# Altium PCB NeoLink Basic Main Board.PcbDoc (part 1 of 5)
Units mm, origin at the board's own origin, x right, y up, seen from the top; angles counter-clockwise.
Board outline 70 x 115 mm, 6 copper layers (Top Layer, Layer 2, Layer 3, Layer 4, Layer 5, Bottom Layer), stack 1.148 mm thick; 467 components, 265 nets, 1397 pads, 1169 vias.
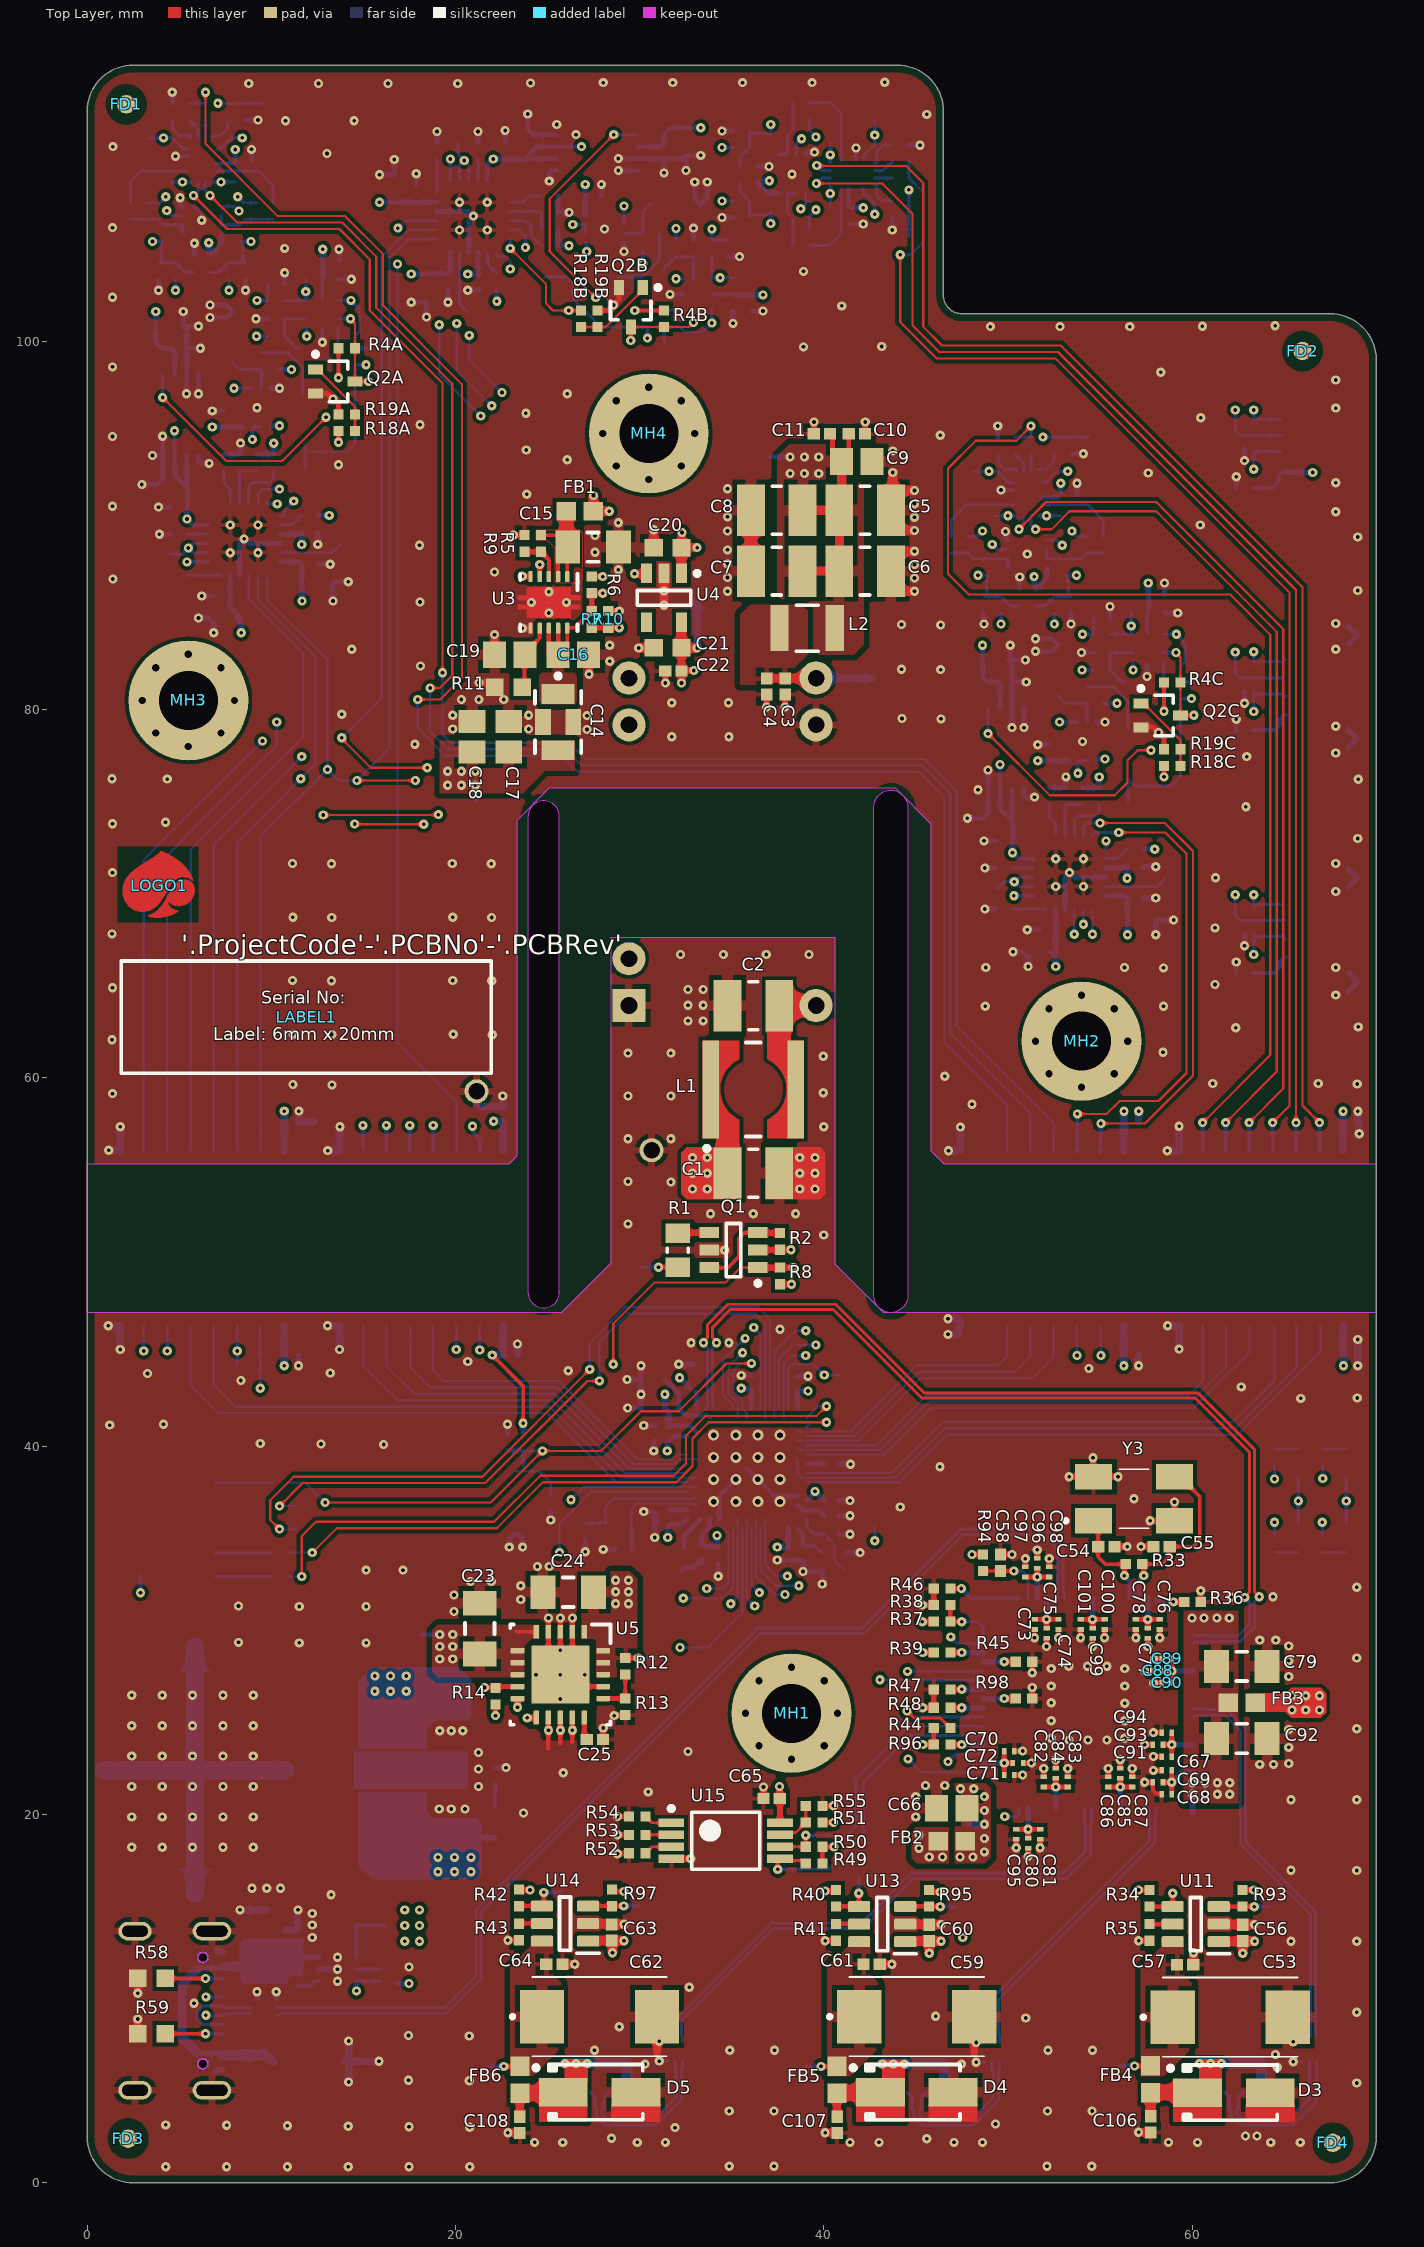
[diagram p0: Top Layer view]
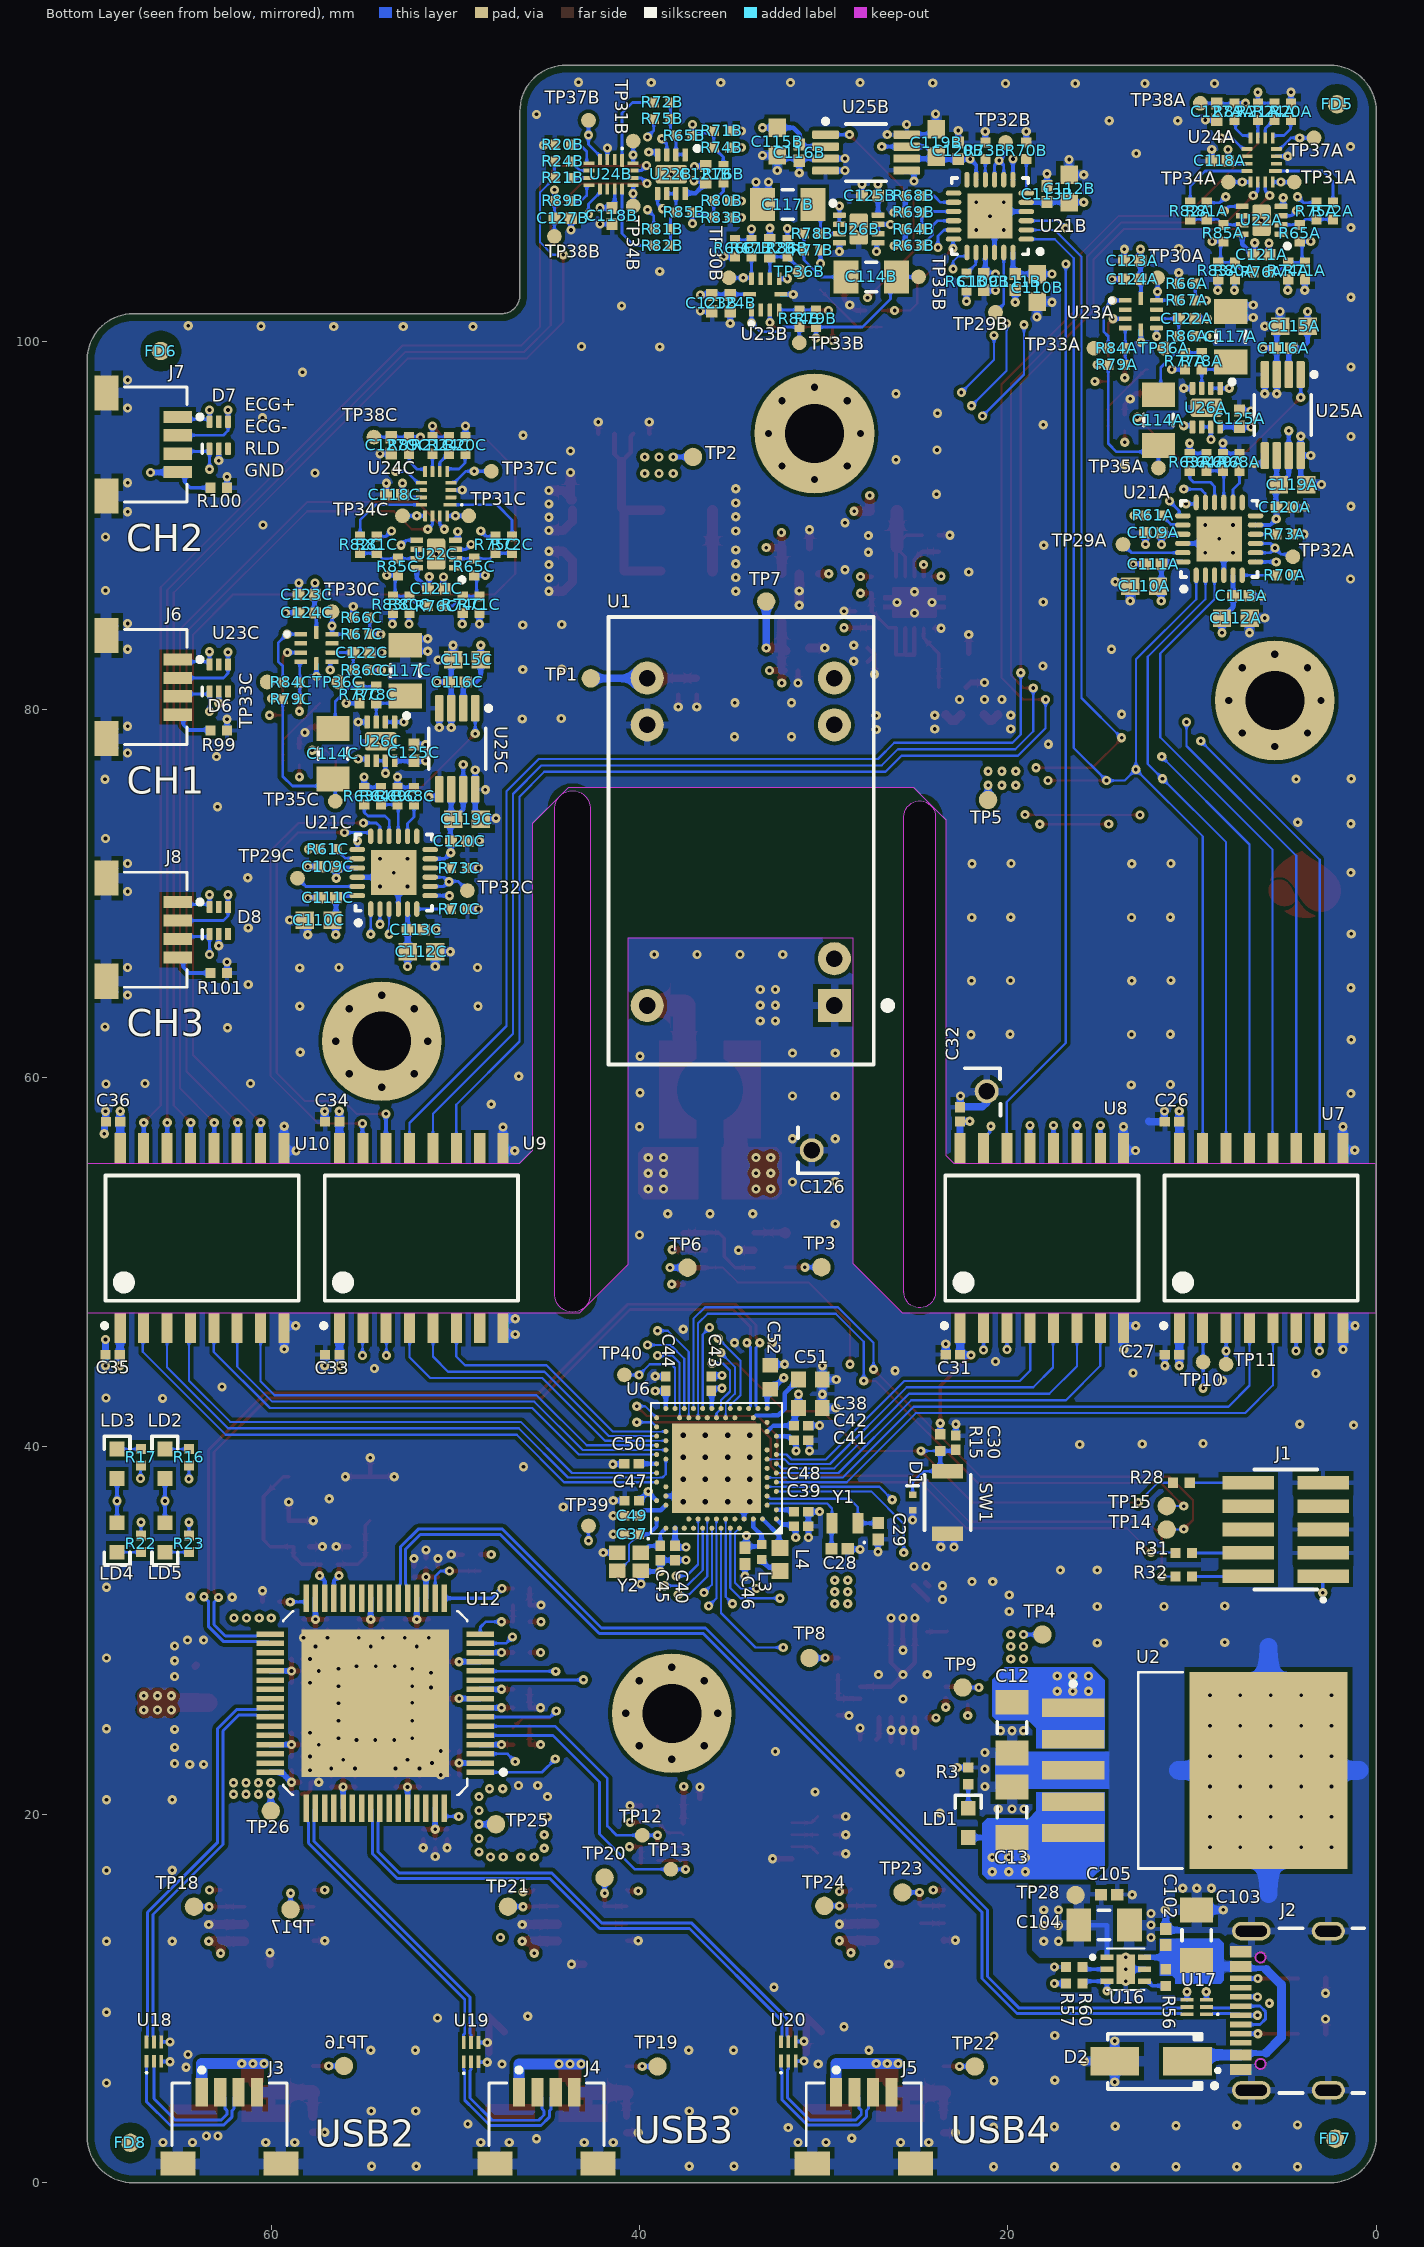
[diagram p1: Bottom Layer view, seen from below]
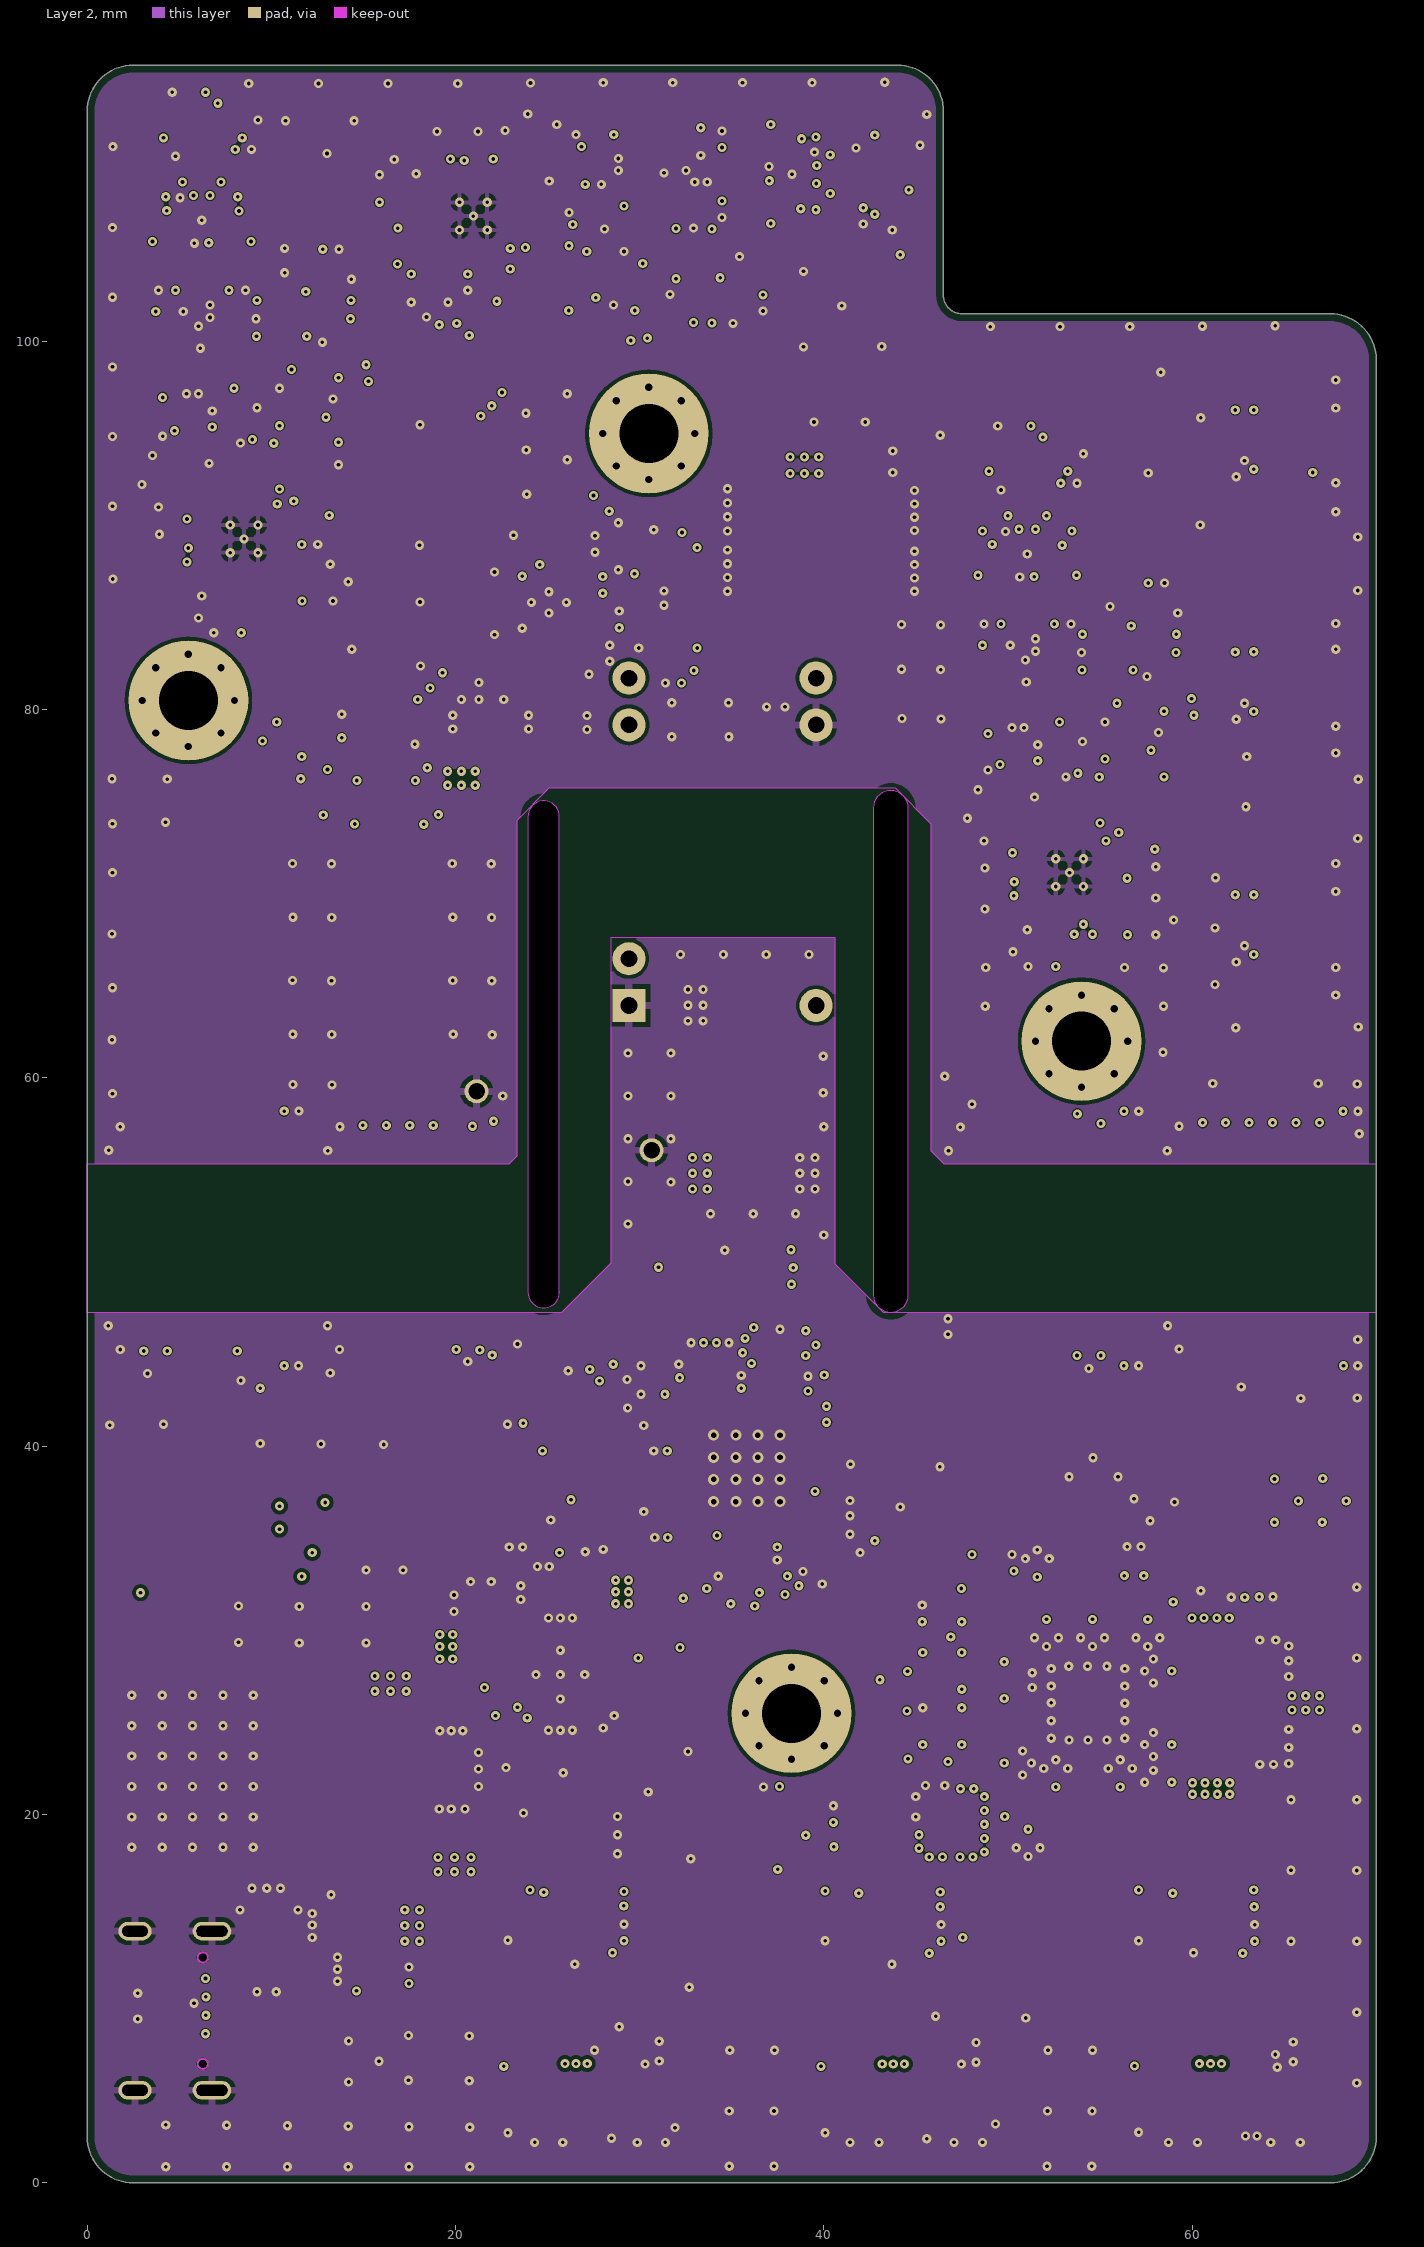
[diagram p2: Layer 2]
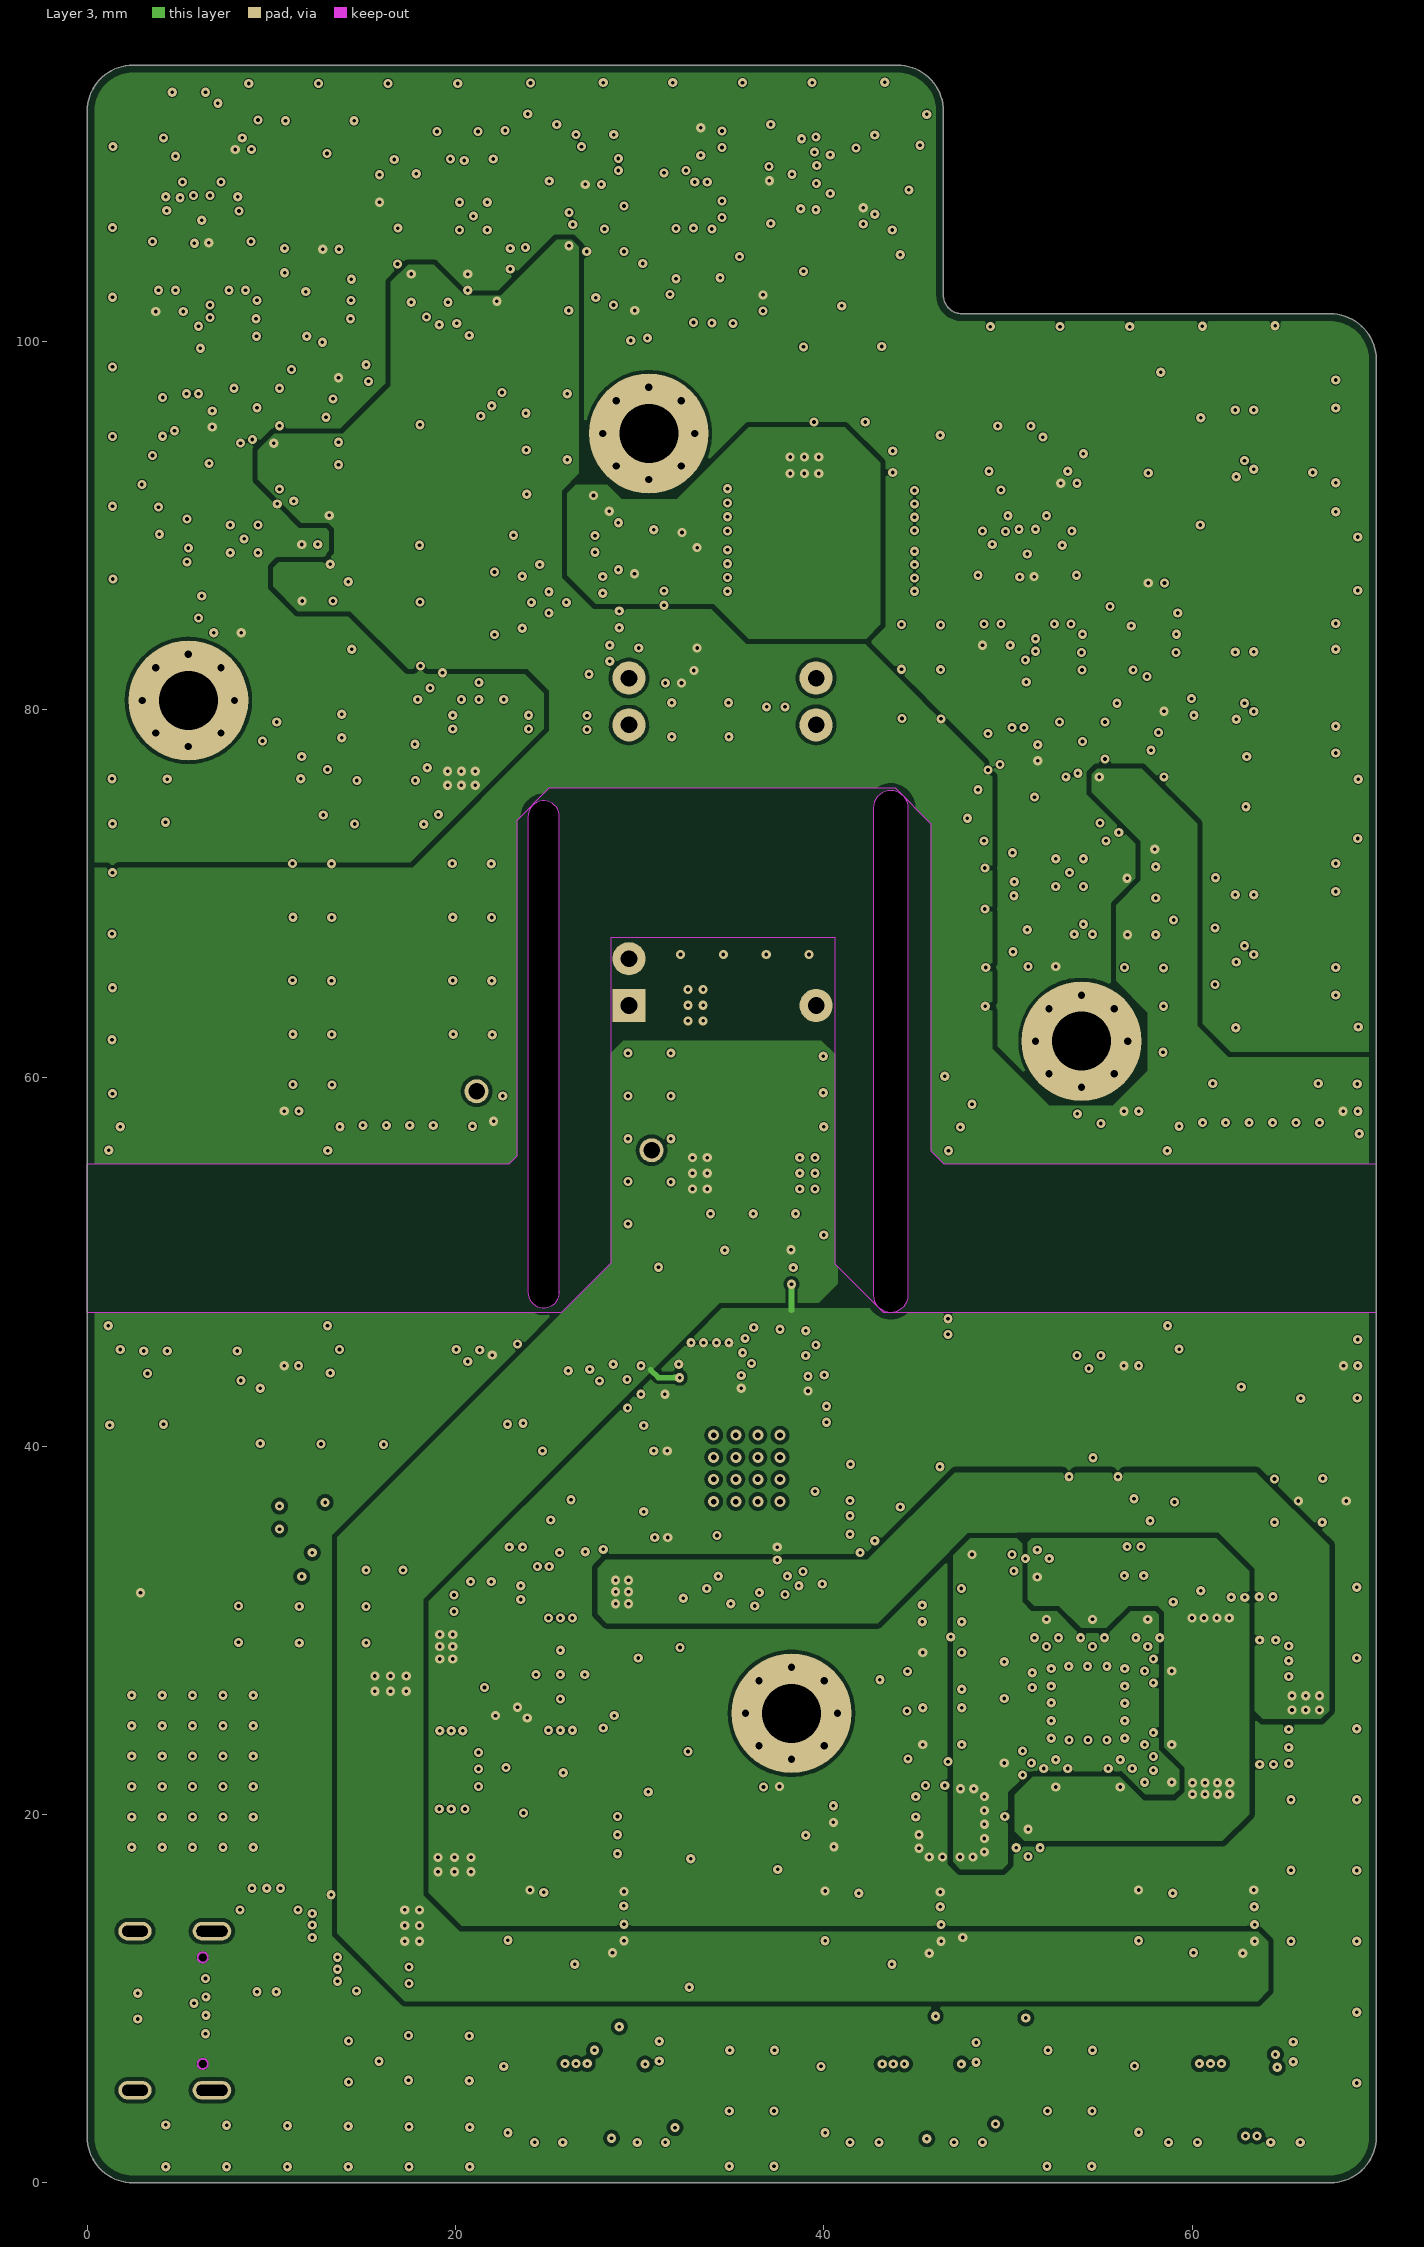
[diagram p3: Layer 3]
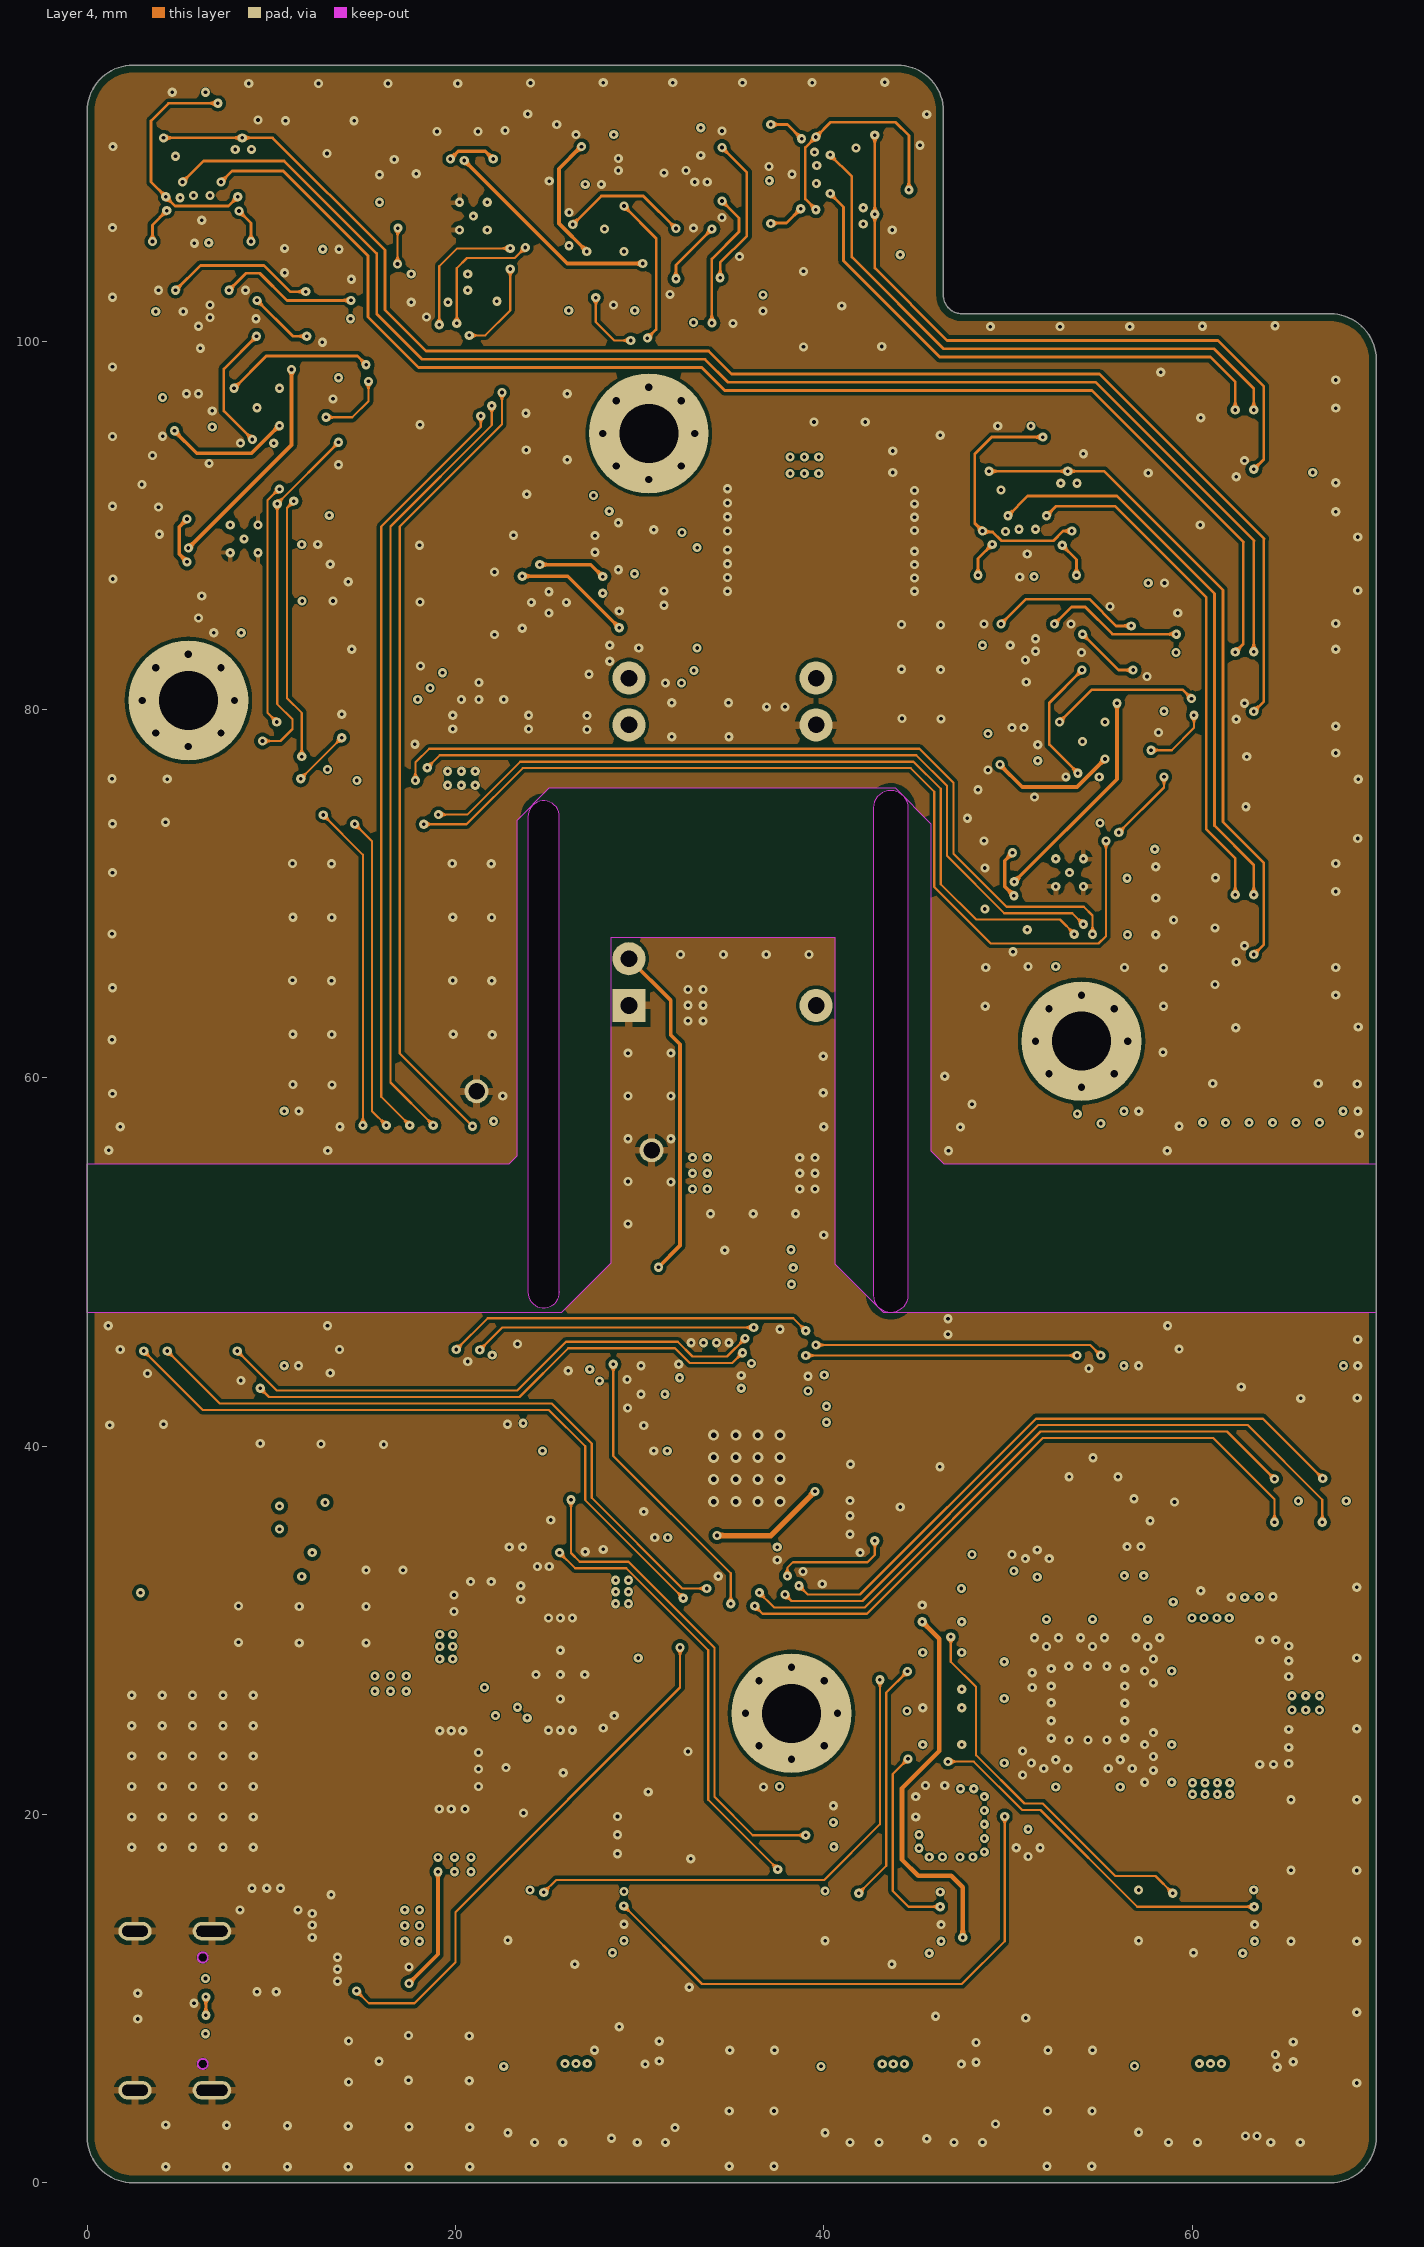
[diagram p4: Layer 4]
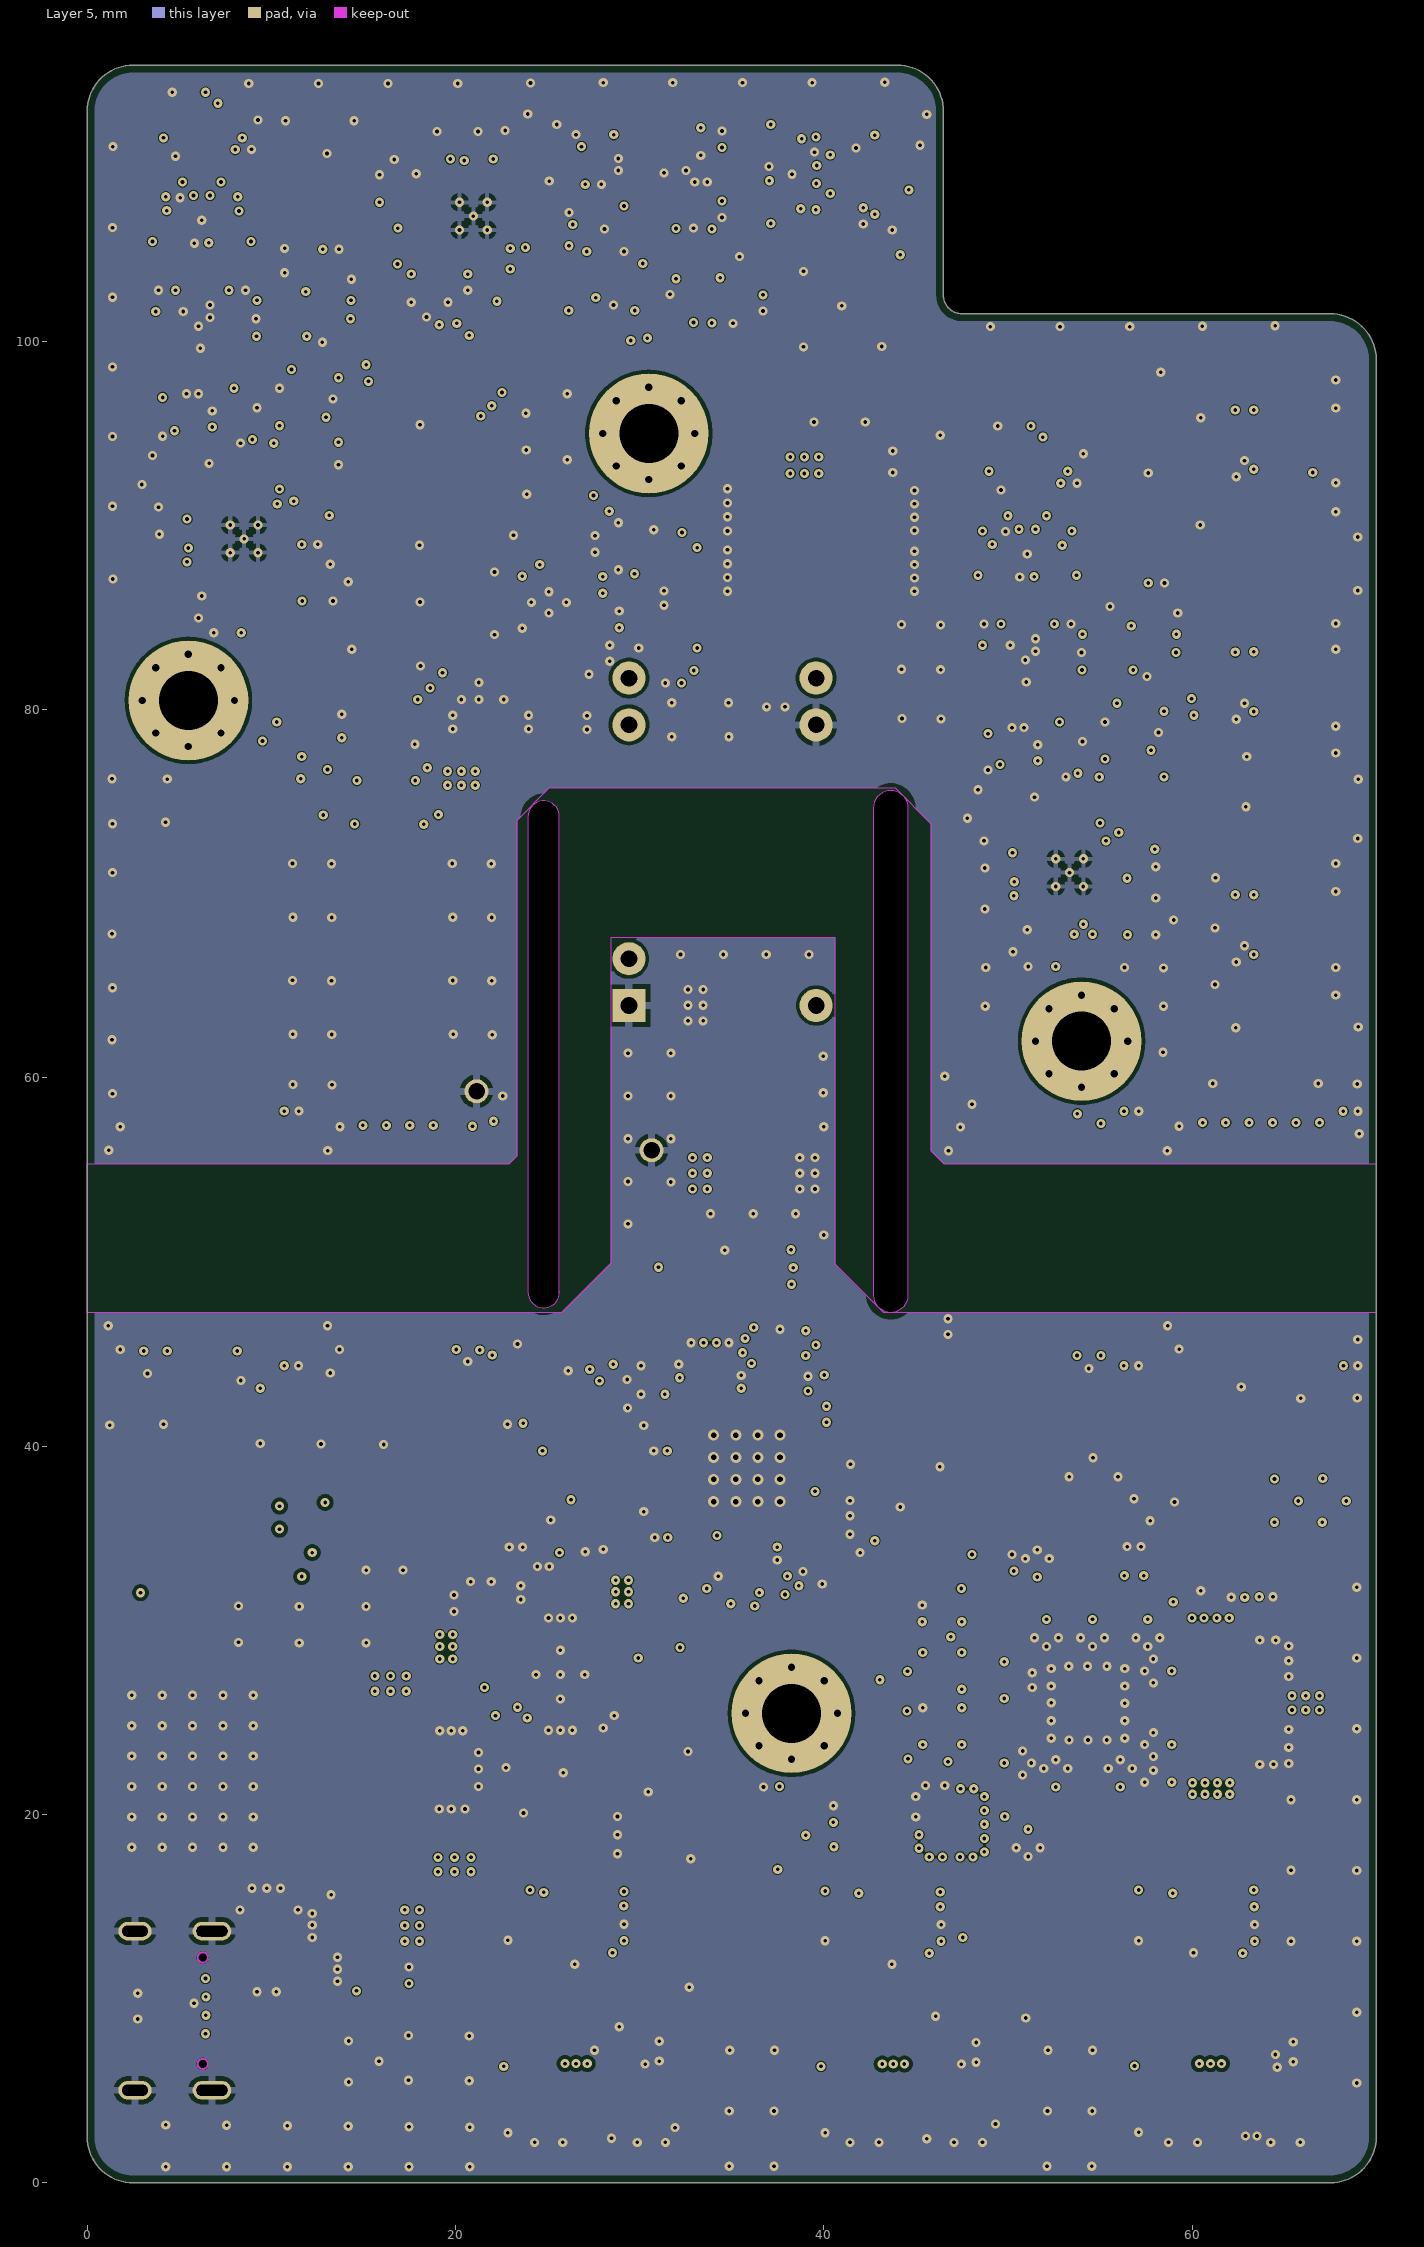
[diagram p5: Layer 5]

## Layer stack, top to bottom
Top Solder: solder mask 0.0102, Solder Resist, Dk 3.5
Top Layer: signal copper 0.035
Dielectric 2: prepreg 0.1195, 2116 RC58%, Dk 4.45
Layer 2: signal copper 0.035
Dielectric 4: core 0.23, 2116 RC58%, Dk 4.6
Layer 3: signal copper 0.035
Dielectric 1: prepreg 0.239, 2116 RC58% x 2, Dk 4.45
Layer 4: signal copper 0.035
Dielectric 5: core 0.23, 2116 RC58%, Dk 4.6
Layer 5: signal copper 0.035
Dielectric 3: prepreg 0.1195, 2116 RC58%, Dk 4.45
Bottom Layer: signal copper 0.035
Bottom Solder: solder mask 0.0102, Solder Resist, Dk 3.5

## Board outline
0,2.5 0,112.5 cw(c2.499,112.501) 2.5,115 44,115 cw(c44,112.5) 46.5,112.5 46.5,102.5 ccw(c47.5,102.5) 47.5,101.5 67.5,101.5 cw(c67.5,99) 70,99 70,2.5 cw(c67.501,2.499) 67.5,0 2.5,0 cw(c2.499,2.499)
cut-out: 23.935,48.372 ccw(c24.793,48.373) 25.65,48.386 25.65,48.375 25.65,74.189 ccw(c24.792,74.187) 23.935,74.175
cut-out: 42.684,48.204 ccw(c43.641,48.236) 44.599,48.208 44.6,48.225 44.6,74.679 ccw(c43.643,74.646) 42.685,74.675

## Design rules (kind name [scope] priority, off if disabled: settings)
BoardOutlineClearance [All] p1: gap=0.4 ignorepadtopadclearanceinfootprint=FALSE
Clearance Clearance_ISO [InNetClass('ISO_ECG_POWER') Or InNetClass('ISO_ECG_SIGNAL') Or InNetClass('A_Nets') Or InNetClass('B_Nets') Or InNetClass('C_Nets') Or InNetClass('ECG AFE_Nets') vs InNetClass('USB Ports_Nets') Or InNetClass('USB 2.0 Hub_Nets') Or (InNetClass('MCU_Nets') And Not InNetClass('ISO_ECG_SIGNAL')) Or (InNetClass('Power Supply_Nets') And Not InNetClass('ISO_ECG_POWER'))] p1: gap=5 ignorepadtopadclearanceinfootprint=FALSE except(0: Arc-Text Arc-Hole Track-Text Track-Hole SMDPad-Text SMDPad-Hole THPad-Text THPad-Hole Via-Text Via-Hole Fill-Text Fill-Hole Poly-Text Poly-Hole Region-Text Region-Hole Text-Text Text-Hole)
Clearance Clearance_Poly [(OnLayer('Keep-Out Layer'))] p2: gap=0 ignorepadtopadclearanceinfootprint=FALSE
Clearance Clearance_nRF [HasFootprint('NRF52840-QIAA') OR HasFootprint('SON65P200X200X80-7N')  OR HasFootprint('FP-DRL0006A-MFG')] p3: gap=0.12 ignorepadtopadclearanceinfootprint=FALSE except(0: Arc-Hole Track-Hole SMDPad-Hole THPad-Hole Via-Hole Fill-Hole Poly-Hole Region-Hole Text-Hole; 0.074: Track-SMDPad; 0.1: SMDPad-Region; 0.127: Via-Via; 0.15: SMDPad-SMDPad; 0.2: Arc-Fill Arc-Poly Track-Fill Track-Poly SMDPad-THPad SMDPad-Fill SMDPad-Poly THPad-THPad THPad-Fill THPad-Poly Via-Fill Via-Poly Fill-Poly Poly-Region Region-Region; 0.3: Fill-Fill Poly-Poly)
Clearance Clearance_OpAmp [HasFootprint('SON50P200X200X80-9N')] p4: gap=0.12 ignorepadtopadclearanceinfootprint=FALSE except(0: Arc-Hole Track-Hole SMDPad-Via SMDPad-Hole THPad-Hole Via-Hole Fill-Hole Poly-Hole Region-Hole Text-Hole; 0.074: Track-SMDPad; 0.127: Via-Via; 0.15: SMDPad-SMDPad; 0.2: Arc-Fill Arc-Poly Track-Fill Track-Poly SMDPad-THPad SMDPad-Fill SMDPad-Poly THPad-THPad THPad-Fill THPad-Poly Via-Fill Via-Poly Fill-Poly Poly-Region Region-Region; 0.3: Fill-Fill Poly-Poly)
Clearance [All] p5: gap=0.12 ignorepadtopadclearanceinfootprint=FALSE except(0: Arc-Hole Track-Hole SMDPad-Hole THPad-Hole Via-Hole Fill-Hole Poly-Hole Region-Hole Text-Hole; 0.125: Via-Via; 0.2: Arc-Fill Arc-Poly Track-Fill Track-Poly SMDPad-SMDPad SMDPad-THPad SMDPad-Fill SMDPad-Poly THPad-THPad THPad-Fill THPad-Poly Via-Fill Via-Poly Fill-Poly Poly-Region Region-Region; 0.3: Fill-Fill Poly-Poly)
Creepage Creepage_ISO [InNetClass('ISO_ECG_POWER') Or InNetClass('ISO_ECG_SIGNAL') Or InNetClass('A_Nets') Or InNetClass('B_Nets') Or InNetClass('C_Nets') Or InNetClass('ECG AFE_Nets') vs InNetClass('USB Ports_Nets') Or InNetClass('USB 2.0 Hub_Nets') Or (InNetClass('MCU_Nets') And Not InNetClass('ISO_ECG_SIGNAL')) Or (InNetClass('Power Supply_Nets') And Not InNetClass('ISO_ECG_POWER'))] p1: checkdistance=8 ignoreinternallayers=FALSE
DiffPairsRouting DiffPairsRouting_USB [All] p1: maxlimit=0.254 minlimit=0.127 mostfreqgap=0.254 toplayer_maxgap=0.127 toplayer_prefgap=0.127 toplayer_minwidth=0.161 toplayer_maxwidth=0.161 toplayer_prefwidth=0.161 midlayer1_minwidth=0.1 midlayer1_maxwidth=0.381 midlayer1_prefwidth=0.381 midlayer2_minwidth=0.1 midlayer2_maxwidth=0.381 midlayer2_prefwidth=0.381 midlayer3_minwidth=0.1 midlayer3_maxwidth=0.381 midlayer3_prefwidth=0.381 midlayer4_minwidth=0.1 midlayer4_maxwidth=0.381 midlayer4_prefwidth=0.381 bottomlayer_maxgap=0.127 bottomlayer_prefgap=0.127 bottomlayer_minwidth=0.161 bottomlayer_maxwidth=0.161 bottomlayer_prefwidth=0.161 maxuncoupledlength=12.7
HoleSize [All] p1: absolutevalues=TRUE maxlimit=6.3 minlimit=0.2 maxpercent=80.000 minpercent=20.000
HoleToHoleClearance [All] p1: gap=0.4 allowstackedmicrovias=TRUE
MinimumAnnularRing [All] p1: minimumring=0.15
MinimumSolderMaskSliver [All] p1: minsoldermaskwidth=0.05
PlaneConnect [All] p1: pad.planeconnectstyle=Relief pad.reliefexpansion=0.508 pad.reliefentries=4 pad.reliefconductorwidth=0.254 pad.reliefairgap=0.254 via.planeconnectstyle=Direct via.reliefexpansion=0.508 via.reliefentries=4 via.reliefconductorwidth=0.254 via.reliefairgap=0.254
PolygonConnect PolygonConnect_SMD_Pad [HasFootprint('MLCC-0402-L') OR HasFootprint('MLCC-0402-N') OR HasFootprint('RES-0402-N')  OR HasFootprint('RES-0402-L') OR HasFootprint('MLCC-0201-N')  OR HasFootprint('KTT0005A') OR HasFootprint('ECMF240A100N6') OR HasFootprint ('FP-DCK0006A-MFG')  OR HasFootprint ('SON50P200X200X80-9N')   OR HasFootprint ('THS4536RUNR') OR HasFootprint ('SON65P200X200X80-7N') OR HasFootprint('TI-RGE24-2450X2450TP_V')  OR HasFootprint('FP-DGK0008A-MFG')  OR HasFootprint('XTAL-2.0x1.6')  OR HasFootprint('XTAL-5.0x3.2-ECS')    OR HasFootprint('TSSOP-8-N')  OR HasFootprint('FTSH-105-01-X-DV-K')] p1: connectstyle=Relief reliefconductorwidth=0.25 reliefentries=4 polygonreliefangle="90 Angle" airgapwidth=0.25
PolygonConnect PolygonConnect_C1206_C1210 [HasFootprint('MLCC-1206-N') OR HasFootprint('MLCC-1210-N') OR HasFootprint('MLCC-0805-N')  OR HasFootprint('SM04B-SRSS-TB(LF)(SN)')  OR HasFootprint('MLCC-0603-N')  OR HasFootprint('MLCC-0603-L')   OR HasFootprint('JEDEC-DO-214AC-N')  OR HasFootprint('T495D') OR HasFootprint('JEDEC-SOIC-16W-N')] p2: thpad.connectstyle=Relief thpad.reliefconductorwidth=0.4 thpad.reliefentries=4 thpad.polygonreliefangle="90 Angle" thpad.airgapwidth=0.25 smdpad.connectstyle=Relief smdpad.reliefconductorwidth=0.6 smdpad.reliefentries=4 smdpad.polygonreliefangle="90 Angle" smdpad.airgapwidth=0.25 via.connectstyle=Direct via.reliefconductorwidth=0.25 via.reliefentries=4 via.polygonreliefangle="90 Angle" via.airgapwidth=0.25
PolygonConnect [All] p3: thpad.connectstyle=Relief thpad.reliefconductorwidth=0.4 thpad.reliefentries=4 thpad.polygonreliefangle="90 Angle" thpad.airgapwidth=0.25 smdpad.connectstyle=Direct smdpad.reliefconductorwidth=0.254 smdpad.reliefentries=4 smdpad.polygonreliefangle="90 Angle" smdpad.airgapwidth=0.254 via.connectstyle=Direct via.reliefconductorwidth=0.254 via.reliefentries=4 via.polygonreliefangle="90 Angle" via.airgapwidth=0.254
RoutingVias [All] p1: holewidth=0.711 width=1.27 viastyle="Through Hole" minholewidth=0.2 minwidth=0.23 maxholewidth=0.711 maxwidth=1.27
ShortCircuit [HasFootprint('SON50P200X200X80-9N')] p1: allowed=TRUE
SilkToSilkClearance [All] p1: silktosilkclearance=0.12
SilkToSolderMaskClearance [IsPad] p1: minsilkscreentomaskgap=0.1 clearancetoexposedcopper=TRUE
SolderMaskExpansion [All] p1: expansion=0.102 istentingtop=FALSE
SupplyNets "Schematic Supply Nets_14" [InNet('DN4_VBUS')] p1: voltage=0.000
SupplyNets "Schematic Supply Nets_12" [InNet('GND_ISO')] p2: voltage=0.000
SupplyNets "Schematic Supply Nets_11" [InNet('PP_1V1')] p3: voltage=0.000
SupplyNets "Schematic Supply Nets_10" [InNet('PP_3V3_IO_ISO')] p4: voltage=0.000
SupplyNets "Schematic Supply Nets_9" [InNet('PP_1V1_USB')] p5: voltage=0.000
SupplyNets "Schematic Supply Nets_8" [InNet('PP_3V3_ISO')] p6: voltage=0.000
SupplyNets "Schematic Supply Nets_7" [InNet('DN3_VBUS')] p7: voltage=0.000
SupplyNets "Schematic Supply Nets_6" [InNet('DN2_VBUS')] p8: voltage=0.000
SupplyNets "Schematic Supply Nets_5" [InNet('PP_5V_ISO')] p9: voltage=0.000
SupplyNets "Schematic Supply Nets_4" [InNet('GND')] p10: voltage=0.000
SupplyNets "Schematic Supply Nets_3" [InNet('PP_3V3_USB')] p11: voltage=0.000
SupplyNets "Schematic Supply Nets_2" [InNet('PP_5V_VBUS')] p12: voltage=0.000
SupplyNets "Schematic Supply Nets_1" [InNet('PP_3V3')] p13: voltage=0.000
SupplyNets "Schematic Supply Nets" [InNet('PP_VBUS_UP')] p14: voltage=0.000
UnRoutedNet [All] p1: checkbadconnections=TRUE
Width [All] p1: maxlimit=5 minlimit=0.076 preferedwidth=0.15 minimp=50.000000 maximp=50.000000 favimp=50.000000
21 further rules are at their usual default settings.

## Classes and differential pairs
net class "USB Ports_Nets": DN2_VBUS DN3_VBUS DN4_VBUS GND NetC106_1 NetC107_1 NetC108_1 NetJ2_A5 NetJ2_A8 NetJ2_B5 NetJ2_B8 NetR56_2 NetR57_1 PP_3V3 PP_5V_VBUS PP_VBUS_UP USB_DN2.DN_N USB_DN2.DN_P USB_DN2_N USB_DN2_P USB_DN3.DN_N USB_DN3.DN_P USB_DN3_N USB_DN3_P USB_DN4.DN_N USB_DN4.DN_P USB_DN4_N USB_DN4_P USB_UP.UP_N USB_UP.UP_P USB_UP_CON_N USB_UP_CON_P USB_VBUS_FAULT
net class "USB 2.0 Hub_Nets": AUTOENZ DN2_VBUS DN3_VBUS DN4_VBUS FULLPWRMG GANGED GND GRSTZ HUB_I2C.SCL HUB_I2C.SDA NetC54_1 NetC55_1 NetR35_1 NetR36_2 NetR37_1 NetR41_1 NetR43_1 NetR51_2 NetR52_1 NetR53_1 NetR54_1 NetU12_23 NetU12_24 NetU12_26 NetU12_27 NetU12_28 NetU12_35 NetU12_36 NetU12_38 NetU12_39 NetU12_40 NetU12_43 NetU12_44 NetU12_46 NetU12_47 NetU12_51 NetU12_52 NetU12_54 NetU12_55 NetU12_58 NetU12_59 NetU12_61 NetU12_62 OVERCUR1Z OVERCUR2Z OVERCUR3Z OVERCUR4Z PP_1V1 PP_1V1_USB PP_3V3 PP_3V3_USB PP_5V_VBUS PWRCTL_POL PWRON1 PWRON2 PWRON3 PWRON4 SMBUSZ TEST USB_DN2.DN_N USB_DN2.DN_P USB_DN3.DN_N USB_DN3.DN_P USB_DN4.DN_N USB_DN4.DN_P USB_nRF.SOC_N USB_nRF.SOC_P USB_UP.UP_N USB_UP.UP_P
net class "Power Supply_Nets": ENABLE_5V_ISO GND GND_ISO NetC2_1 NetC3_1 NetC14_1 NetC15_1 NetC19_1 NetC25_1 NetLD1_K NetQ1_D1 NetQ1_D2 NetR1_1 NetR5_2 NetR6_2 NetR7_2 NetR12_2 NetR14_2 NetU1_7 NetU1_8 PP_1V1 PP_3V3 PP_3V3_IO_ISO PP_3V3_ISO PP_5V_ISO PP_5V_VBUS
net class "NeoLink Basic Main Board - Top Level_Nets": DAC1_CTRL.nCS_ISO DAC1_CTRL.nLDAC_ISO DAC1_CTRL.nRST_ISO DAC1_CTRL.PDN_ISO DAC2_CTRL.nCS_ISO DAC2_CTRL.nLDAC_ISO DAC2_CTRL.nRST_ISO DAC2_CTRL.PDN_ISO DAC3_CTRL.nCS_ISO DAC3_CTRL.nLDAC_ISO DAC3_CTRL.nRST_ISO DAC3_CTRL.PDN_ISO DAC_SPI.MOSI_ISO DAC_SPI.SCLK_ISO ECG_CH1.SW_NEG_ISO ECG_CH1.SW_POS_ISO ECG_CH1.SW_RLD_ISO ECG_CH2.SW_NEG_ISO ECG_CH2.SW_POS_ISO ECG_CH2.SW_RLD_ISO ECG_CH3.SW_NEG_ISO ECG_CH3.SW_POS_ISO ECG_CH3.SW_RLD_ISO ENABLE_5V_ISO HUB_I2C.SCL HUB_I2C.SDA NetMH1_MH NetMH2_MH NetMH3_MH NetMH4_MH USB_DN2.DN_N USB_DN2.DN_P USB_DN3.DN_N USB_DN3.DN_P USB_DN4.DN_N USB_DN4.DN_P USB_nRF.SOC_N USB_nRF.SOC_P USB_UP.UP_N USB_UP.UP_P USB_VBUS_FAULT
net class MCU_Nets: CLK_32M_SOC_XTALI CLK_32M_SOC_XTALO DAC1_CTRL.nCS_ISO DAC1_CTRL.nLDAC_ISO DAC1_CTRL.nRST_ISO DAC1_CTRL.PDN_ISO DAC1_nCS DAC1_nLDAC DAC1_nRST DAC1_PDN DAC2_CTRL.nCS_ISO DAC2_CTRL.nLDAC_ISO DAC2_CTRL.nRST_ISO DAC2_CTRL.PDN_ISO DAC2_nCS DAC2_nLDAC DAC2_nRST DAC2_PDN DAC3_CTRL.nCS_ISO DAC3_CTRL.nLDAC_ISO DAC3_CTRL.nRST_ISO DAC3_CTRL.PDN_ISO DAC3_nCS DAC3_nLDAC DAC3_nRST DAC3_PDN DAC_SPI.MOSI_ISO DAC_SPI.SCLK_ISO DAC_SPI_MOSI DAC_SPI_SCLK DCC DCC_L DEC1 DEC3 DEC4_6 DEC5 DECUSB ECG_CH1.SW_NEG_ISO ECG_CH1.SW_POS_ISO ECG_CH1.SW_RLD_ISO ECG_CH1_LED_IND ECG_CH1_SW_NEG ECG_CH1_SW_POS ECG_CH1_SW_RLD ECG_CH2.SW_NEG_ISO ECG_CH2.SW_POS_ISO ECG_CH2.SW_RLD_ISO ECG_CH2_LED_IND ECG_CH2_SW_NEG ECG_CH2_SW_POS ECG_CH2_SW_RLD ECG_CH3.SW_NEG_ISO ECG_CH3.SW_POS_ISO ECG_CH3.SW_RLD_ISO ECG_CH3_LED_IND ECG_CH3_SW_NEG ECG_CH3_SW_POS ECG_CH3_SW_RLD ENABLE_5V_ISO GND GND_ISO HUB_I2C.SCL HUB_I2C.SDA MCU_TEST_POINT1 MCU_TEST_POINT2 NetC28_1 NetC29_1 NetJ1_6 NetJ1_7 NetJ1_8 NetLD2_K NetLD3_K NetLD4_K NetLD5_K NetU6_A18 NetU6_A20 NetU6_AB2 NetU6_AC9 NetU6_AC15 NetU6_AD8 NetU6_B9 NetU6_B19 NetU6_M2 NetU6_T2 NetU6_U1 NetU9_7 NetU9_10 PP_3V3 PP_3V3_IO_ISO PP_5V_VBUS PRG_NRST PRG_SWCLK PRG_SWDIO SOC_ANT SOC_NRST SOC_SWCLK SOC_SWDIO UART_DBG_RX UART_DBG_TX USB_nRF.SOC_N USB_nRF.SOC_P USB_VBUS_FAULT VCOM_LED_IND
net class "ECG AFE_Nets": DAC1_CTRL.nCS_ISO DAC1_CTRL.nLDAC_ISO DAC1_CTRL.nRST_ISO DAC1_CTRL.PDN_ISO DAC2_CTRL.nCS_ISO DAC2_CTRL.nLDAC_ISO DAC2_CTRL.nRST_ISO DAC2_CTRL.PDN_ISO DAC3_CTRL.nCS_ISO DAC3_CTRL.nLDAC_ISO DAC3_CTRL.nRST_ISO DAC3_CTRL.PDN_ISO DAC_SPI.MOSI_ISO DAC_SPI.SCLK_ISO ECG_CH1.SW_NEG_ISO ECG_CH1.SW_POS_ISO ECG_CH1.SW_RLD_ISO ECG_CH1_CON_NEG ECG_CH1_CON_POS ECG_CH1_CON_RLD ECG_CH2.SW_NEG_ISO ECG_CH2.SW_POS_ISO ECG_CH2.SW_RLD_ISO ECG_CH2_CON_NEG ECG_CH2_CON_POS ECG_CH2_CON_RLD ECG_CH3.SW_NEG_ISO ECG_CH3.SW_POS_ISO ECG_CH3.SW_RLD_ISO ECG_CH3_CON_NEG ECG_CH3_CON_POS ECG_CH3_CON_RLD GND_ISO NetD6_3 NetD7_3 NetD8_3 NetJ6_4 NetJ7_4 NetJ8_4
net class C_Nets: DAC1_1V25_REFC DAC1_SPI_SDOC DAC1_VOUTC DAC3_CTRL.nCS_ISO DAC3_CTRL.nLDAC_ISO DAC3_CTRL.nRST_ISO DAC3_CTRL.PDN_ISO DAC_SPI.MOSI_ISO DAC_SPI.SCLK_ISO ECG_CH1_AN_NEGC ECG_CH1_AN_POSC ECG_CH1_AN_RLDC ECG_CH1_NEGC ECG_CH1_POSC ECG_CH3.SW_NEG_ISO ECG_CH3.SW_POS_ISO ECG_CH3.SW_RLD_ISO ECG_CH3_CON_NEG ECG_CH3_CON_POS ECG_CH3_CON_RLD FDA1_1V25_REFC GND_ISO NetC114C_1 NetC114C_2 NetC117C_1 NetQ2C_G NetR20C_1 NetR21C_1 NetR24C_1 NetR61C_2 NetR63C_2 NetR64C_2 NetR65C_1 NetR66C_2 NetR67C_2 NetR68C_1 NetR70C_1 NetR73C_1 NetR76C_2 NetR79C_2 NetR80C_1 NetR86C_1 NetR89C_1 NetU21C_12 NetU21C_13 NetU23C_2 NetU23C_8 NetU24C_2 NetU24C_10 POWER_EN_ISOC PP_3V3_IO_ISO PP_3V3_ISO
net class B_Nets: DAC1_1V25_REFB DAC1_SPI_SDOB DAC1_VOUTB DAC2_CTRL.nCS_ISO DAC2_CTRL.nLDAC_ISO DAC2_CTRL.nRST_ISO DAC2_CTRL.PDN_ISO DAC_SPI.MOSI_ISO DAC_SPI.SCLK_ISO ECG_CH1_AN_NEGB ECG_CH1_AN_POSB ECG_CH1_AN_RLDB ECG_CH1_NEGB ECG_CH1_POSB ECG_CH2.SW_NEG_ISO ECG_CH2.SW_POS_ISO ECG_CH2.SW_RLD_ISO ECG_CH2_CON_NEG ECG_CH2_CON_POS ECG_CH2_CON_RLD FDA1_1V25_REFB GND_ISO NetC114B_1 NetC114B_2 NetC117B_1 NetQ2B_G NetR20B_1 NetR21B_1 NetR24B_1 NetR61B_2 NetR63B_2 NetR64B_2 NetR65B_1 NetR66B_2 NetR67B_2 NetR68B_1 NetR70B_1 NetR73B_1 NetR76B_2 NetR79B_2 NetR80B_1 NetR86B_1 NetR89B_1 NetU21B_12 NetU21B_13 NetU23B_2 NetU23B_8 NetU24B_2 NetU24B_10 POWER_EN_ISOB PP_3V3_IO_ISO PP_3V3_ISO
net class A_Nets: DAC1_1V25_REFA DAC1_CTRL.nCS_ISO DAC1_CTRL.nLDAC_ISO DAC1_CTRL.nRST_ISO DAC1_CTRL.PDN_ISO DAC1_SPI_SDOA DAC1_VOUTA DAC_SPI.MOSI_ISO DAC_SPI.SCLK_ISO ECG_CH1.SW_NEG_ISO ECG_CH1.SW_POS_ISO ECG_CH1.SW_RLD_ISO ECG_CH1_AN_NEGA ECG_CH1_AN_POSA ECG_CH1_AN_RLDA ECG_CH1_CON_NEG ECG_CH1_CON_POS ECG_CH1_CON_RLD ECG_CH1_NEGA ECG_CH1_POSA FDA1_1V25_REFA GND_ISO NetC114A_1 NetC114A_2 NetC117A_1 NetQ2A_G NetR20A_1 NetR21A_1 NetR24A_1 NetR61A_2 NetR63A_2 NetR64A_2 NetR65A_1 NetR66A_2 NetR67A_2 NetR68A_1 NetR70A_1 NetR73A_1 NetR76A_2 NetR79A_2 NetR80A_1 NetR86A_1 NetR89A_1 NetU21A_12 NetU21A_13 NetU23A_2 NetU23A_8 NetU24A_2 NetU24A_10 POWER_EN_ISOA PP_3V3_IO_ISO PP_3V3_ISO
net class ISO_ECG_POWER: GND_ISO NetC3_1 NetC14_1 NetC15_1 NetC19_1 NetR5_2 NetR6_2 NetR7_2 NetU1_7 NetU1_8 PP_3V3_IO_ISO PP_3V3_ISO PP_5V_ISO
net class ISO_ECG_SIGNAL: DAC1_CTRL.nCS_ISO DAC1_CTRL.nLDAC_ISO DAC1_CTRL.nRST_ISO DAC1_CTRL.PDN_ISO DAC2_CTRL.nCS_ISO DAC2_CTRL.nLDAC_ISO DAC2_CTRL.nRST_ISO DAC2_CTRL.PDN_ISO DAC3_CTRL.nCS_ISO DAC3_CTRL.nLDAC_ISO DAC3_CTRL.nRST_ISO DAC3_CTRL.PDN_ISO DAC_SPI.MOSI_ISO DAC_SPI.SCLK_ISO ECG_CH1.SW_NEG_ISO ECG_CH1.SW_POS_ISO ECG_CH1.SW_RLD_ISO ECG_CH2.SW_NEG_ISO ECG_CH2.SW_POS_ISO ECG_CH2.SW_RLD_ISO ECG_CH3.SW_NEG_ISO ECG_CH3.SW_POS_ISO ECG_CH3.SW_RLD_ISO GND_ISO PP_3V3_IO_ISO
channel class "AFE Channel": A B C
component class "USB Ports": C102 C103 C104 C105 C106 C107 C108 D2 D3 D4 D5 FB4 FB5 FB6 J2 J3 J4 J5 R56 R57 R58 R59 R60 TP28 U16 U17 U18 U19 U20
component class "USB 2.0 Hub": C53 C54 C55 C56 C57 C58 C59 C60 C61 C62 C63 C64 C65 C66 C67 C68 C69 C70 C71 C72 C73 C74 C75 C76 C77 C78 C79 C80 C81 C82 C83 C84 C85 C86 C87 C88 C89 C90 C91 C92 C93 C94 C95 C96 C97 C98 C99 C100 C101 FB2 FB3 R33 R34 R35 R36 R37 R38 R39 R40 R41 R42 R43 R44 R45 R46 R47 R48 R49 R50 R51 R52 R53 R54 R55 R93 R94 R95 R96 R97 R98 TP16 TP17 TP18 TP19 TP20 TP21 TP22 TP23 TP24 TP25 TP26 U11 U12 U13 U14 U15 Y3
component class "Power Supply": C1 C2 C3 C4 C5 C6 C7 C8 C9 C10 C11 C12 C13 C14 C15 C16 C17 C18 C19 C20 C21 C22 C23 C24 C25 C126 FB1 L1 L2 LD1 Q1 R1 R2 R3 R5 R6 R7 R8 R9 R10 R11 R12 R13 R14 TP1 TP2 TP3 TP4 TP5 TP6 TP7 TP8 TP9 U1 U2 U3 U4 U5
component class "NeoLink Basic Main Board - Top Level": FD1 FD2 FD3 FD4 FD5 FD6 FD7 FD8 LABEL1 LOGO1 MH1 MH2 MH3 MH4 PCB1
component class MCU: C26 C27 C28 C29 C30 C31 C32 C33 C34 C35 C36 C37 C38 C39 C40 C41 C42 C43 C44 C45 C46 C47 C48 C49 C50 C51 C52 D1 J1 L3 L4 LD2 LD3 LD4 LD5 R15 R16 R17 R22 R23 R28 R31 R32 SW1 TP10 TP11 TP12 TP13 TP14 TP15 TP39 TP40 U6 U7 U8 U9 U10 Y1 Y2
component class "ECG AFE": D6 D7 D8 J6 J7 J8 R99 R100 R101
component class A: C109A C110A C111A C112A C113A C114A C115A C116A C117A C118A C119A C120A C121A C122A C123A C124A C125A C127A Q2A R4A R18A R19A R20A R21A R24A R61A R63A R64A R65A R66A R67A R68A R69A R70A R71A R72A R73A R74A R75A R76A R77A R78A R79A R80A R81A R82A R83A R84A R85A R86A R89A TP29A TP30A TP31A TP32A TP33A TP34A TP35A TP36A TP37A TP38A U21A U22A U23A U24A U25A U26A
component class B: C109B C110B C111B C112B C113B C114B C115B C116B C117B C118B C119B C120B C121B C122B C123B C124B C125B C127B Q2B R4B R18B R19B R20B R21B R24B R61B R63B R64B R65B R66B R67B R68B R69B R70B R71B R72B R73B R74B R75B R76B R77B R78B R79B R80B R81B R82B R83B R84B R85B R86B R89B TP29B TP30B TP31B TP32B TP33B TP34B TP35B TP36B TP37B TP38B U21B U22B U23B U24B U25B U26B
component class C: C109C C110C C111C C112C C113C C114C C115C C116C C117C C118C C119C C120C C121C C122C C123C C124C C125C C127C Q2C R4C R18C R19C R20C R21C R24C R61C R63C R64C R65C R66C R67C R68C R69C R70C R71C R72C R73C R74C R75C R76C R77C R78C R79C R80C R81C R82C R83C R84C R85C R86C R89C TP29C TP30C TP31C TP32C TP33C TP34C TP35C TP36C TP37C TP38C U21C U22C U23C U24C U25C U26C
differential pair USB_UP_CON: +USB_UP_CON_P -USB_UP_CON_N
differential pair USB_UP.UP: +USB_UP.UP_P -USB_UP.UP_N
differential pair USB_nRF.SOC: +USB_nRF.SOC_P -USB_nRF.SOC_N
differential pair USB_DN4.DN: +USB_DN4.DN_P -USB_DN4.DN_N
differential pair USB_DN4: +USB_DN3_P -USB_DN3_N
differential pair USB_DN3.DN: +USB_DN3.DN_P -USB_DN3.DN_N
differential pair USB_DN3: +USB_DN2_P -USB_DN2_N
differential pair USB_DN2.DN: +USB_DN2.DN_P -USB_DN2.DN_N
differential pair USB_DN2: +USB_DN4_P -USB_DN4_N

## Components (designator, comment, footprint, x,y, rotation, side; value= is the part's Value field where it differs from the comment)
C1 "22uF" MLCC-1210-N 36.175,54.825 r0 top
C2 "22uF" MLCC-1210-N 36.175,63.925 r180 top
C3 "100nF" MLCC-0402-N 37.9,81.26 r270 top
C4 "100nF" MLCC-0402-N 36.9,81.26 r270 top
C5 "22uF" MLCC-1210-N 42.25,90.825 r0 top
C6 "22uF" MLCC-1210-N 42.25,87.525 r0 top
C7 "22uF" MLCC-1210-N 37.45,87.525 r180 top
C8 "22uF" MLCC-1210-N 37.45,90.825 r180 top
C9 "1uF" MLCC-0805-N 41.8,93.475 r0 top
C10 "100nF" MLCC-0402-N 41.8,94.975 r0 top
C11 "100nF" MLCC-0402-N 39.9,94.975 r180 top
C12 "10uF" MLCC-1206-N 19.775,24.725 r270 bottom
C13 "10uF" MLCC-1206-N 19.775,20.125 r90 bottom
C14 "27uF" FEEDTHROUGH-1206 25.575,79.329 r270 top
C15 "10uF" MLCC-1206-N 27.475,88.825 r0 top
C16 "10uF" MLCC-0805-N 26.4,82.975 r0 top
C17 "10uF" MLCC-0805-N 22.9,78.529 r90 top
C18 "10uF" MLCC-0805-N 20.9,78.529 r90 top
C19 "4.7uF" MLCC-0805-N 22.95,82.975 r180 top
C20 "1uF" MLCC-0603-N 31.525,88.8 r180 top
C21 "1uF" MLCC-0603-N 31.525,83.35 r180 top
C22 "100nF" MLCC-0402-N 31.835,82.1 r180 top
C23 "10uF" MLCC-1206-N 21.325,30.1 r90 top
C24 "10uF" MLCC-1206-N 26.125,32.075 r180 top
C25 "1nF" MLCC-0402-N 27.575,24.075 r0 top
C26 "100nF" MLCC-0402-L 11.09,57.625 r0 bottom
C27 "100nF" MLCC-0402-L 11.09,44.975 r180 bottom
C28 "12pF" MLCC-0402-N 29.135,34.425 r180 bottom
C29 "12pF" MLCC-0402-N 27.05,35.385 r270 bottom
C30 "100nF" MLCC-0402-L 22.825,40.2 r90 bottom
C31 "100nF" MLCC-0402-L 22.99,44.975 r180 bottom
C32 "100nF" MLCC-0402-L 22.6,58.025 r90 bottom
C33 "100nF" MLCC-0402-L 56.69,44.975 r180 bottom
C34 "100nF" MLCC-0402-L 56.69,57.625 r0 bottom
C35 "100nF" MLCC-0402-L 68.615,44.975 r180 bottom
C36 "100nF" MLCC-0402-L 68.59,57.625 r0 bottom
C37 "12pF" MLCC-0402-L 40.425,35.225 r0 bottom
C38 "4.7uF" MLCC-0603-L 30.725,42.075 r180 bottom
C39 "100nF" MLCC-0402-L 31.225,35.65 r180 bottom
C40 "100nF" MLCC-0402-L 38.075,34.2 r270 bottom
C41 "100nF" MLCC-0402-L 31.225,40.325 r180 bottom
C42 "100nF" MLCC-0402-L 31.225,41.125 r180 bottom
C43 "100nF" MLCC-0402-L 36.1,43.4 r90 bottom
C44 "100nF" MLCC-0402-L 38.575,43.4 r90 bottom
C45 "12pF" MLCC-0402-L 38.875,34.2 r270 bottom
C46 "1uF" MLCC-0402-N 34.275,34.05 r270 bottom
C47 "47nF" MLCC-0402-L 40.425,37.05 r0 bottom
C48 "100nF" MLCC-0402-L 31.225,36.45 r180 bottom
C49 "100pF" MLCC-0402-L 40.425,36.225 r0 bottom
C50 "820pF" MLCC-0402-L 40.44,39.05 r0 bottom
C51 "4.7uF" MLCC-0603-L 30.725,43.625 r180 bottom
C52 "4.7uF" MLCC-0603-L 32.9,43.75 r90 bottom
C53 "T495D157K010ATE100" T495D 62.075,9 r0 top value=150uF
C54 "18pF" MLCC-0402-N 55.35,34.55 r0 top
C55 "18pF" MLCC-0402-N 58.35,34.55 r180 top
C56 "100nF" MLCC-0402-N 62.75,13.575 r90 top
C57 "100nF" MLCC-0402-N 59.625,11.85 r0 top
C58 "1uF" MLCC-0402-N 49.6,33.675 r90 top
C59 "T495D157K010ATE100" T495D 45.05,9.025 r0 top value=150uF
C60 "100nF" MLCC-0402-N 45.725,13.575 r90 top
C61 "100nF" MLCC-0402-N 42.6,11.875 r0 top
C62 "T495D157K010ATE100" T495D 27.825,9.025 r0 top value=150uF
C63 "100nF" MLCC-0402-N 28.5,13.6 r90 top
C64 "100nF" MLCC-0402-N 25.375,11.875 r0 top
C65 "100nF" MLCC-0402-N 37.175,20.875 r180 top
C66 "1uF" MLCC-0805-N 46.95,20.35 r180 top
C67 "1.0nF" MLCC-0201-N 58.625,22.4 r180 top
C68 "10nF" MLCC-0201-N 58.625,21.1 r180 top
C69 "100nF" MLCC-0201-N 58.15,21.75 r180 top
C70 "1.0nF" MLCC-0201-N 50.075,23.45 r0 top
C71 "10nF" MLCC-0201-N 50.075,22.15 r0 top
C72 "100nF" MLCC-0201-N 50.55,22.8 r0 top
C73 "1.0nF" MLCC-0201-N 51.45,30.325 r270 top
C74 "10nF" MLCC-0201-N 52.75,30.325 r270 top
C75 "100nF" MLCC-0201-N 52.1,29.85 r270 top
C76 "1.0nF" MLCC-0201-N 58.25,30.325 r270 top
C77 "10nF" MLCC-0201-N 57.6,29.85 r270 top
C78 "100nF" MLCC-0201-N 56.95,30.325 r270 top
C79 "10uF" MLCC-1206-N 62.7,28.05 r0 top
C80 "1.0nF" MLCC-0201-N 51.1,18.45 r270 top
C81 "10nF" MLCC-0201-N 51.75,18.925 r270 top
C82 "100nF" MLCC-0201-N 51.95,21.775 r90 top
C83 "1.0nF" MLCC-0201-N 53.25,21.775 r90 top
C84 "10nF" MLCC-0201-N 52.6,22.25 r90 top
C85 "100nF" MLCC-0201-N 56.1,22.25 r90 top
C86 "1.0nF" MLCC-0201-N 55.45,21.775 r90 top
C87 "10nF" MLCC-0201-N 56.75,21.775 r90 top
C88 "100nF" MLCC-0201-N 58.15,27.8 r180 top
C89 "1.0nF" MLCC-0201-N 58.625,28.45 r180 top
C90 "10nF" MLCC-0201-N 58.625,27.15 r180 top
C91 "100nF" MLCC-0201-N 58.625,23.15 r180 top
C92 "10uF" MLCC-1206-N 62.7,24.125 r0 top
C93 "1.0nF" MLCC-0201-N 58.15,23.8 r180 top
C94 "10nF" MLCC-0201-N 58.625,24.45 r180 top
C95 "100nF" MLCC-0201-N 50.45,18.925 r270 top
C96 "1.0nF" MLCC-0201-N 51.6,33.65 r90 top
C97 "10nF" MLCC-0201-N 50.95,33.175 r90 top
C98 "100nF" MLCC-0201-N 52.25,33.175 r90 top
C99 "1.0nF" MLCC-0201-N 54.6,29.85 r270 top
C100 "10nF" MLCC-0201-N 55.25,30.325 r270 top
C101 "100nF" MLCC-0201-N 53.95,30.325 r270 top
C102 "100nF" MLCC-0402-N 11.425,13.35 r90 bottom
C103 "10uF" MLCC-1206-N 9.75,13.45 r90 bottom
C104 "10uF" MLCC-1206-N 14.775,14 r180 bottom
C105 "100nF" MLCC-0402-N 14.5,15.65 r180 bottom
C106 "100nF" MLCC-0402-N 57.75,3.175 r270 top
C107 "100nF" MLCC-0402-N 40.725,3.15 r270 top
C108 "100nF" MLCC-0402-N 23.5,3.15 r270 top
C109A "100nF" MLCC-0402-N 12.1,89.6 r0 bottom (schematic designator C109)
C109B "100nF" MLCC-0402-N 21.3,103.225 r270 bottom (schematic designator C109)
C109C "100nF" MLCC-0402-N 56.925,71.475 r0 bottom (schematic designator C109)
C110A "10uF" MLCC-0603-N 12.6,86.7 r0 bottom (schematic designator C110)
C110B "10uF" MLCC-0603-N 18.4,102.9 r270 bottom (schematic designator C110)
C110C "10uF" MLCC-0603-N 57.425,68.575 r0 bottom (schematic designator C110)
C111A "100nF" MLCC-0402-N 12.1,87.9 r0 bottom (schematic designator C111)
C111B "100nF" MLCC-0402-N 19.6,103.225 r270 bottom (schematic designator C111)
C111C "100nF" MLCC-0402-N 56.925,69.775 r0 bottom (schematic designator C111)
C112A "10uF" MLCC-0603-N 7.625,84.975 r180 bottom (schematic designator C112)
C112B "10uF" MLCC-0603-N 16.675,108.3 r90 bottom (schematic designator C112)
C112C "10uF" MLCC-0603-N 51.85,66.85 r180 bottom (schematic designator C112)
C113A "100nF" MLCC-0402-N 7.325,86.175 r180 bottom (schematic designator C113)
C113B "100nF" MLCC-0402-N 17.875,108 r90 bottom (schematic designator C113)
C113C "100nF" MLCC-0402-N 52.16,68.05 r180 bottom (schematic designator C113)
C114A "100nF" MLCC-1206-N 11.825,95.725 r270 bottom (schematic designator C114)
C114B "100nF" MLCC-1206-N 27.425,103.5 r180 bottom (schematic designator C114)
C114C "100nF" MLCC-1206-N 56.65,77.6 r270 bottom (schematic designator C114)
C115A "10uF" MLCC-0603-N 4.46,100.825 r0 bottom (schematic designator C115)
C115B "10uF" MLCC-0603-N 32.525,110.85 r270 bottom (schematic designator C115)
C115C "10uF" MLCC-0603-N 49.375,82.7 r0 bottom (schematic designator C115)
C116A "100nF" MLCC-0402-N 5.05,99.625 r0 bottom (schematic designator C116)
C116B "100nF" MLCC-0402-N 31.325,110.25 r270 bottom (schematic designator C116)
C116C "100nF" MLCC-0402-N 49.9,81.5 r0 bottom (schematic designator C116)
C117A "47nF" MLCC-1206-N 7.9,100.25 r90 bottom (schematic designator C117)
C117B "47nF" MLCC-1206-N 31.95,107.425 r0 bottom (schematic designator C117)
C117C "47nF" MLCC-1206-N 52.725,82.125 r90 bottom (schematic designator C117)
C118A "100nF" MLCC-0402-N 8.5,109.8 r0 bottom (schematic designator C118)
C118B "100nF" MLCC-0402-N 41.5,106.81 r270 bottom (schematic designator C118)
C118C "100nF" MLCC-0402-N 53.325,91.675 r0 bottom (schematic designator C118)
C119A "10uF" MLCC-0603-N 4.55,92.2 r180 bottom (schematic designator C119)
C119B "10uF" MLCC-0603-N 23.9,110.775 r90 bottom (schematic designator C119)
C119C "10uF" MLCC-0603-N 49.375,74.05 r180 bottom (schematic designator C119)
C120A "1nF" MLCC-0402-N 4.975,91 r180 bottom (schematic designator C120)
C120B "1nF" MLCC-0402-N 22.7,110.35 r90 bottom (schematic designator C120)
C120C "1nF" MLCC-0402-N 49.8,72.85 r180 bottom (schematic designator C120)
C121A "100nF" MLCC-0402-N 6.225,104.7 r180 bottom (schematic designator C121)
C121B "100nF" MLCC-0402-N 36.4,109.075 r90 bottom (schematic designator C121)
C121C "100nF" MLCC-0402-N 51.05,86.575 r180 bottom (schematic designator C121)
C122A "100nF" MLCC-0402-N 10.275,101.225 r180 bottom (schematic designator C122)
C122B "100nF" MLCC-0402-N 32.925,105.05 r90 bottom (schematic designator C122)
C122C "100nF" MLCC-0402-N 55.1,83.1 r180 bottom (schematic designator C122)
C123A "1uF" MLCC-0402-N 13.25,104.375 r0 bottom (schematic designator C123)
C123B "1uF" MLCC-0402-N 36.075,102.075 r270 bottom (schematic designator C123)
C123C "1uF" MLCC-0402-N 58.075,86.25 r0 bottom (schematic designator C123)
C124A "100nF" MLCC-0402-N 13.25,103.375 r0 bottom (schematic designator C124)
C124B "100nF" MLCC-0402-N 35.075,102.075 r270 bottom (schematic designator C124)
C124C "100nF" MLCC-0402-N 58.075,85.25 r0 bottom (schematic designator C124)
C125A "100nF" MLCC-0402-N 7.425,95.8 r90 bottom (schematic designator C125)
C125B "100nF" MLCC-0402-N 27.49,107.9 r0 bottom (schematic designator C125)
C125C "100nF" MLCC-0402-N 52.25,77.665 r90 bottom (schematic designator C125)
C126 "330pF" CAP-RD-8.4x9.5x11.6 25.9,57.675 r180 bottom
C127A "22pF" MLCC-0402-N 8.65,112.475 r270 bottom (schematic designator C127)
C127B "22pF" MLCC-0402-N 44.175,106.675 r180 bottom (schematic designator C127)
C127C "22pF" MLCC-0402-N 53.475,94.35 r270 bottom (schematic designator C127)
D1 "SZESD9101P2T5G" SOD-923 25.175,36.95 r270 bottom
D2 "SMAJ6.0A" JEDEC-DO-214AC-N 12.225,6.6 r0 bottom
D3 "SMAJ6.0A" JEDEC-DO-214AC-N 62.275,4.9 r0 top
D4 "SMAJ6.0A" JEDEC-DO-214AC-N 45.05,4.925 r0 top
D5 "SMAJ6.0A" JEDEC-DO-214AC-N 27.825,4.925 r0 top
D6 "TPD4E1B06DRLR" FP-DRL0006A-MFG 62.85,81.725 r90 bottom
D7 "TPD4E1B06DRLR" FP-DRL0006A-MFG 62.85,94.9 r90 bottom
D8 "TPD4E1B06DRLR" FP-DRL0006A-MFG 62.85,68.55 r90 bottom
FB1 "BLM18EG221SN1D" FB-0603-N 26.75,90.775 r180 top value="220 Ohms @ 100MHz"
FB2 "BLM18EG221SN1D" FB-0603-N 46.95,18.55 r180 top value="220 Ohms @ 100MHz"
FB3 "BLM18EG221SN1D" FB-0603-N 62.7,26.075 r0 top value="220 Ohms @ 100MHz"
FB4 "BLM18EG221SN1D" FB-0603-N 57.75,5.625 r270 top value="220 Ohms @ 100MHz"
FB5 "BLM18EG221SN1D" FB-0603-N 40.725,5.6 r270 top value="220 Ohms @ 100MHz"
FB6 "BLM18EG221SN1D" FB-0603-N 23.5,5.6 r270 top value="220 Ohms @ 100MHz"
FD1 "FIDUCIAL" FIDUCIAL-1MM 2.125,112.875 r270 top
FD2 "FIDUCIAL" FIDUCIAL-1MM 66,99.475 r270 top
FD3 "FIDUCIAL" FIDUCIAL-1MM 2.225,2.4 r270 top
FD4 "FIDUCIAL" FIDUCIAL-1MM 67.65,2.175 r270 top
FD5 "FIDUCIAL" FIDUCIAL-1MM 2.125,112.875 r180 bottom
FD6 "FIDUCIAL" FIDUCIAL-1MM 66,99.475 r180 bottom
FD7 "FIDUCIAL" FIDUCIAL-1MM 2.225,2.4 r180 bottom
FD8 "FIDUCIAL" FIDUCIAL-1MM 67.65,2.175 r180 bottom
J1 "FTSH-105-01-LM-DV-K-P-TR" FTSH-105-01-X-DV-K 4.915,35.48 r90 bottom
J2 "USB4105-GF-A" "GCT USB4105-GF-A" 2.6,9.35 r90 bottom locked
J3 "SM04B-SRSS-TB(LF)(SN)" SM04B-SRSS-TB(LF)(SN) 62.275,2.825 r0 bottom locked
J4 "SM04B-SRSS-TB(LF)(SN)" SM04B-SRSS-TB(LF)(SN) 45.05,2.825 r0 bottom locked
J5 "SM04B-SRSS-TB(LF)(SN)" SM04B-SRSS-TB(LF)(SN) 27.825,2.825 r0 bottom locked
J6 "SM04B-SRSS-TB(LF)(SN)" SM04B-SRSS-TB(LF)(SN) 67.175,81.225 r90 bottom
J7 "SM04B-SRSS-TB(LF)(SN)" SM04B-SRSS-TB(LF)(SN) 67.175,94.4 r90 bottom
J8 "SM04B-SRSS-TB(LF)(SN)" SM04B-SRSS-TB(LF)(SN) 67.175,68.05 r90 bottom
L1 "6.8uH" 78408053006 36.175,59.375 r0 top
L2 "4.7uH" LQW32-1210 39.1,84.425 r0 top
L3 "15nH" FB-0402-L 33.375,34.25 r270 bottom
L4 "10uH" FB-0603-L 32.375,33.85 r270 bottom
LABEL1 "Serial No:" "Label Box, Rectangle, 6mm x 20mm" 11.9,63.3 r0 top
LD1 "150060GS75000" LED-0603-GREEN 22.15,19.55 r90 bottom
LD2 "150060GS75000" LED-0603-GREEN 65.775,39.05 r90 bottom
LD3 "150060GS75000" LED-0603-GREEN 68.375,39.05 r90 bottom
LD4 "150060GS75000" LED-0603-GREEN 68.375,35.05 r270 bottom
LD5 "150060GS75000" LED-0603-GREEN 65.775,35.05 r270 bottom
LOGO1 "Capgemini Logo" "Capgemini Copper Logo - Large" 3.925,70.45 r0 top
MH1 "PCB-MH" PCB-MH-M3-LF-PH 38.251,25.5 r0 top locked
MH2 "PCB-MH" PCB-MH-M3-LF-PH 54,62 r0 top locked
MH3 "PCB-MH" PCB-MH-M3-LF-PH 5.501,80.499 r0 top locked
MH4 "PCB-MH" PCB-MH-M3-LF-PH 30.501,94.999 r0 top locked
Q1 "AO6604" JEDEC-SOT-23-6-N 35.1,50.65 r180 top
Q2A "BSS138PW,115" SOT-323-N 13.475,97.825 r0 top (schematic designator Q2)
Q2B "BSS138PW,115" SOT-323-N 29.525,101.85 r270 top (schematic designator Q2)
Q2C "BSS138PW,115" SOT-323-N 58.3,79.675 r0 top (schematic designator Q2)
R1 "1K" RES-0805-N 32.075,50.65 r90 top
R2 "10K" RES-0402-N 37.625,51.125 r90 top
R3 "330" RES-0402-N 22.15,22.1 r90 bottom
R4A "100K" RES-0402-N 14.1,99.625 r0 top (schematic designator R4)
R4B "100K" RES-0402-N 31.325,101.225 r270 top (schematic designator R4)
R4C "100K" RES-0402-N 58.925,81.475 r0 top (schematic designator R4)
R5 "10K" RES-0402-N 24.65,89.025 r270 top
R6 "100K" RES-0402-N 27.4,86.775 r90 top
R7 "732K" RES-0402-N 27.4,84.9 r270 top
R8 "10K" RES-0402-N 37.625,49.25 r90 top
R9 "10K" RES-0402-N 23.75,89.025 r90 top
R10 "49.9K" RES-0402-N 28.3,84.9 r90 top
R11 "22K" RES-0603-N 22.875,81.225 r180 top
R12 "1.87K" RES-0402-N 29.225,28.05 r270 top
R13 "4.99K" RES-0402-N 29.225,25.85 r270 top
R14 "100K" RES-0402-N 22.175,26.425 r90 top
R15 "10K" RES-0402-N 23.675,40.2 r270 bottom
R16 "1K" RES-0402-N 64.475,39.4 r270 bottom
R17 "1K" RES-0402-N 67.075,39.4 r270 bottom
R18A "220" RES-0402-N 14.1,95.125 r0 top (schematic designator R18)
R18B "220" RES-0402-N 26.825,101.225 r270 top (schematic designator R18)
R18C "220" RES-0402-N 58.925,76.95 r0 top (schematic designator R18)
R19A "100K" RES-0402-N 14.1,96.025 r180 top (schematic designator R19)
R19B "100K" RES-0402-N 27.725,101.225 r90 top (schematic designator R19)
R19C "100K" RES-0402-N 58.925,77.85 r180 top (schematic designator R19)
R20A "0" RES-0402-N 4.625,112.475 r90 bottom (schematic designator R20)
R20B "0" RES-0402-N 44.175,110.675 r0 bottom (schematic designator R20)
R20C "0" RES-0402-N 49.45,94.35 r90 bottom (schematic designator R20)
R21A "0" RES-0402-N 6.425,112.475 r90 bottom (schematic designator R21)
R21B "0" RES-0402-N 44.175,108.875 r0 bottom (schematic designator R21)
R21C "0" RES-0402-N 51.25,94.35 r90 bottom (schematic designator R21)
R22 "1K" RES-0402-N 67.075,34.7 r90 bottom
R23 "1K" RES-0402-N 64.475,34.7 r90 bottom
R24A "0" RES-0402-N 5.525,112.475 r90 bottom (schematic designator R24)
R24B "0" RES-0402-N 44.175,109.775 r0 bottom (schematic designator R24)
R24C "0" RES-0402-N 50.35,94.35 r90 bottom (schematic designator R24)
R28 "22" RES-0402-N 10.575,38.02 r0 bottom
R31 "22" RES-0402-N 10.45,34.21 r0 bottom
R32 "22" RES-0402-N 10.45,32.925 r0 bottom
R33 "1M" RES-0402-N 56.85,33.6 r0 top
R34 "100K" RES-0402-N 57.7,15.45 r270 top
R35 "52.3K" RES-0402-N 57.7,13.6 r270 top
R36 "9.53K" RES-0402-N 60.025,31.55 r180 top
R37 "90.9K" RES-0402-N 46.425,30.475 r180 top
R38 "10K" RES-0402-N 46.425,31.375 r180 top
R39 "100K" RES-0402-N 46.425,28.8 r0 top
R40 "100K" RES-0402-N 40.675,15.45 r270 top
R41 "52.3K" RES-0402-N 40.675,13.6 r270 top
R42 "100K" RES-0402-N 23.45,15.475 r270 top
R43 "52.3K" RES-0402-N 23.45,13.625 r270 top
R44 "4.7K" RES-0402-N 46.425,24.7 r0 top
R45 "4.7K" RES-0402-N 50.875,28.3 r0 top
R46 "4.7K" RES-0402-N 46.425,32.275 r180 top
R47 "4.7K" RES-0402-N 46.425,26.8 r180 top
R48 "4.7K" RES-0402-N 46.425,25.8 r180 top
R49 "4.7K" RES-0402-N 39.475,17.35 r180 top
R50 "4.7K" RES-0402-N 39.475,18.25 r180 top
R51 "10K" RES-0402-N 39.475,19.575 r180 top
R52 "1.1K" RES-0402-N 29.875,17.9 r180 top
R53 "1.1K" RES-0402-N 29.875,18.9 r180 top
R54 "1.1K" RES-0402-N 29.875,19.9 r180 top
R55 "1.1K" RES-0402-N 39.475,20.475 r0 top
R56 "300K" RES-0402-N 11.425,11.15 r270 bottom
R57 "47K" RES-0402-N 16.4,11.725 r0 bottom
R58 "5.1K" RES-0603-N 3.5,11.1 r180 top
R59 "5.1K" RES-0603-N 3.5,8.1 r180 top
R60 "300K" RES-0402-N 16.4,10.825 r180 bottom
R61A "10K" RES-0402-N 12.1,90.55 r180 bottom (schematic designator R61)
R61B "10K" RES-0402-N 22.25,103.225 r90 bottom (schematic designator R61)
R61C "10K" RES-0402-N 56.925,72.425 r180 bottom (schematic designator R61)
R63A "10K" RES-0402-N 10.125,93.425 r270 bottom (schematic designator R63)
R63B "10K" RES-0402-N 25.125,105.2 r180 bottom (schematic designator R63)
R63C "10K" RES-0402-N 54.95,75.3 r270 bottom (schematic designator R63)
R64A "10K" RES-0402-N 9.225,93.425 r270 bottom (schematic designator R64)
R64B "10K" RES-0402-N 25.125,106.1 r180 bottom (schematic designator R64)
R64C "10K" RES-0402-N 54.05,75.3 r270 bottom (schematic designator R64)
R65A "0" RES-0402-N 4.15,105.875 r90 bottom (schematic designator R65)
R65B "0" RES-0402-N 37.575,111.175 r0 bottom (schematic designator R65)
R65C "0" RES-0402-N 48.975,87.75 r90 bottom (schematic designator R65)
R66A "1K" RES-0402-N 10.275,103.125 r180 bottom (schematic designator R66)
R66B "1K" RES-0402-N 34.825,105.05 r90 bottom (schematic designator R66)
R66C "1K" RES-0402-N 55.1,85 r180 bottom (schematic designator R66)
R67A "1K" RES-0402-N 10.275,102.225 r0 bottom (schematic designator R67)
R67B "1K" RES-0402-N 33.925,105.05 r270 bottom (schematic designator R67)
R67C "1K" RES-0402-N 55.1,84.1 r0 bottom (schematic designator R67)
R68A "10K" RES-0402-N 7.425,93.425 r90 bottom (schematic designator R68)
R68B "10K" RES-0402-N 25.125,107.9 r0 bottom (schematic designator R68)
R68C "10K" RES-0402-N 52.25,75.3 r90 bottom (schematic designator R68)
R69A "10K" RES-0402-N 8.325,93.425 r90 bottom (schematic designator R69)
R69B "10K" RES-0402-N 25.125,107 r0 bottom (schematic designator R69)
R69C "10K" RES-0402-N 53.15,75.3 r90 bottom (schematic designator R69)
R70A "0" RES-0402-N 4.975,87.3 r180 bottom (schematic designator R70)
R70B "0" RES-0402-N 19,110.35 r90 bottom (schematic designator R70)
R70C "0" RES-0402-N 49.8,69.175 r180 bottom (schematic designator R70)
R71A "200" RES-0402-N 3.875,103.825 r90 bottom (schematic designator R71)
R71B "200" RES-0402-N 35.525,111.425 r0 bottom (schematic designator R71)
R71C "200" RES-0402-N 48.7,85.7 r90 bottom (schematic designator R71)
R72A "5.1K" RES-0402-N 2.35,107.075 r90 bottom (schematic designator R72)
R72B "5.1K" RES-0402-N 38.775,112.975 r0 bottom (schematic designator R72)
R72C "5.1K" RES-0402-N 46.925,88.95 r90 bottom (schematic designator R72)
R73A "0" RES-0402-N 4.975,89.525 r180 bottom (schematic designator R73)
R73B "0" RES-0402-N 21.225,110.35 r90 bottom (schematic designator R73)
R73C "0" RES-0402-N 49.8,71.4 r180 bottom (schematic designator R73)
R74A "20.0K" RES-0402-N 4.775,103.825 r90 bottom (schematic designator R74)
R74B "20.0K" RES-0402-N 35.525,110.525 r0 bottom (schematic designator R74)
R74C "20.0K" RES-0402-N 49.6,85.7 r90 bottom (schematic designator R74)
R75A "1M" RES-0402-N 3.25,107.075 r90 bottom (schematic designator R75)
R75B "1M" RES-0402-N 38.775,112.075 r0 bottom (schematic designator R75)
R75C "1M" RES-0402-N 47.825,88.95 r90 bottom (schematic designator R75)
R76A "200" RES-0402-N 6.225,103.75 r0 bottom (schematic designator R76)
R76B "200" RES-0402-N 35.45,109.075 r270 bottom (schematic designator R76)
R76C "200" RES-0402-N 51.05,85.625 r0 bottom (schematic designator R76)
R77A "30.1K" RES-0402-N 10.375,98.925 r90 bottom (schematic designator R77)
R77B "30.1K" RES-0402-N 30.625,104.95 r0 bottom (schematic designator R77)
R77C "30.1K" RES-0402-N 55.2,80.8 r90 bottom (schematic designator R77)
R78A "18.2K" RES-0402-N 9.475,98.925 r270 bottom (schematic designator R78)
R78B "18.2K" RES-0402-N 30.625,105.85 r180 bottom (schematic designator R78)
R78C "18.2K" RES-0402-N 54.3,80.8 r270 bottom (schematic designator R78)
R79A "1K" RES-0402-N 14.1,98.725 r180 bottom (schematic designator R79)
R79B "1K" RES-0402-N 30.425,101.225 r90 bottom (schematic designator R79)
R79C "1K" RES-0402-N 58.925,80.575 r180 bottom (schematic designator R79)
R80A "20.0K" RES-0402-N 7.675,103.825 r90 bottom (schematic designator R80)
R80B "20.0K" RES-0402-N 35.525,107.625 r0 bottom (schematic designator R80)
R80C "20.0K" RES-0402-N 52.5,85.7 r90 bottom (schematic designator R80)
R81A "1M" RES-0402-N 9.2,107.075 r90 bottom (schematic designator R81)
R81B "1M" RES-0402-N 38.775,106.1 r0 bottom (schematic designator R81)
R81C "1M" RES-0402-N 54.275,88.95 r90 bottom (schematic designator R81)
R82A "5.1K" RES-0402-N 10.1,107.075 r90 bottom (schematic designator R82)
R82B "5.1K" RES-0402-N 38.775,105.2 r0 bottom (schematic designator R82)
R82C "5.1K" RES-0402-N 55.175,88.95 r90 bottom (schematic designator R82)
R83A "200" RES-0402-N 8.575,103.825 r270 bottom (schematic designator R83)
R83B "200" RES-0402-N 35.525,106.725 r180 bottom (schematic designator R83)
R83C "200" RES-0402-N 53.4,85.7 r270 bottom (schematic designator R83)
R84A "1K" RES-0402-N 14.1,99.625 r0 bottom (schematic designator R84)
R84B "1K" RES-0402-N 31.325,101.225 r270 bottom (schematic designator R84)
R84C "1K" RES-0402-N 58.925,81.475 r0 bottom (schematic designator R84)
R85A "0" RES-0402-N 8.3,105.875 r90 bottom (schematic designator R85)
R85B "0" RES-0402-N 37.575,107 r0 bottom (schematic designator R85)
R85C "0" RES-0402-N 53.125,87.75 r90 bottom (schematic designator R85)
R86A "24" RES-0402-N 10.275,100.275 r0 bottom (schematic designator R86)
R86B "24" RES-0402-N 31.975,105.05 r270 bottom (schematic designator R86)
R86C "24" RES-0402-N 55.1,82.15 r0 bottom (schematic designator R86)
R89A "2.49M" RES-0402-N 7.7,112.475 r90 bottom (schematic designator R89)
R89B "2.49M" RES-0402-N 44.175,107.625 r0 bottom (schematic designator R89)
R89C "2.49M" RES-0402-N 52.525,94.35 r90 bottom (schematic designator R89)
R93 "4.7K" RES-0402-N 62.75,15.45 r270 top
R94 "4.7K" RES-0402-N 48.65,33.675 r270 top
R95 "4.7K" RES-0402-N 45.725,15.45 r270 top
R96 "4.7K" RES-0402-N 46.425,23.8 r0 top
R97 "4.7K" RES-0402-N 28.5,15.475 r270 top
R98 "4.7K" RES-0402-N 50.875,26.3 r0 top
R99 "0" RES-0402-N 62.85,78.875 r180 bottom
R100 "0" RES-0402-N 62.85,92.05 r180 bottom
R101 "0" RES-0402-N 62.85,65.7 r180 bottom
SW1 "TL1017AAAF260QG" TL1017AAAF260QG 23.275,36.95 r270 bottom
TP1 "TP-SMT-CIRCLE" TP-1.0mm#1 42.65,81.7 r90 bottom
TP2 "TP-SMT-CIRCLE" TP-1.0mm#1 37.1,93.725 r90 bottom
TP3 "TP-SMT-CIRCLE" TP-1.0mm#1 30.125,49.725 r270 bottom
TP4 "TP-SMT-CIRCLE" TP-1.0mm#1 18.125,29.775 r90 bottom
TP5 "TP-SMT-CIRCLE" TP-1.0mm#2 21.075,75.1 r90 top
TP6 "TP-SMT-CIRCLE" TP-1.0mm#1 37.4,49.7 r0 bottom
TP7 "TP-SMT-CIRCLE" TP-1.0mm#1 33.125,85.875 r90 bottom
TP8 "TP-SMT-CIRCLE" TP-1.0mm#1 30.775,28.5 r90 bottom
TP9 "TP-SMT-CIRCLE" TP-1.0mm#2 22.45,26.9 r90 top
TP10 "TP-SMT-CIRCLE" TP-0.8mm 9.4,44.575 r90 bottom
TP11 "TP-SMT-CIRCLE" TP-0.8mm 8.15,44.45 r90 bottom
TP12 "TP-SMT-CIRCLE" TP-0.8mm 39.85,18.875 r90 bottom
TP13 "TP-SMT-CIRCLE" TP-0.8mm 38.3,17.025 r90 bottom
TP14 "TP-SMT-CIRCLE" TP-1.0mm#1 11.375,35.475 r90 bottom
TP15 "TP-SMT-CIRCLE" TP-1.0mm#1 11.375,36.75 r90 bottom
TP16 "TP-SMT-CIRCLE" TP-1.0mm#2 56.05,6.35 r90 top
TP17 "TP-SMT-CIRCLE" TP-1.0mm#2 58.95,14.85 r90 top
TP18 "TP-SMT-CIRCLE" TP-1.0mm#1 64.2,15 r90 bottom
TP19 "TP-SMT-CIRCLE" TP-1.0mm#1 39.025,6.325 r90 bottom
TP20 "TP-SMT-CIRCLE" TP-1.0mm#1 41.9,16.575 r90 bottom
TP21 "TP-SMT-CIRCLE" TP-1.0mm#1 47.15,15 r90 bottom
TP22 "TP-SMT-CIRCLE" TP-1.0mm#1 21.8,6.325 r90 bottom
TP23 "TP-SMT-CIRCLE" TP-1.0mm#1 25.725,15.775 r90 bottom
TP24 "TP-SMT-CIRCLE" TP-1.0mm#1 29.968,15.042 r90 bottom
TP25 "TP-SMT-CIRCLE" TP-1.0mm#1 47.8,19.475 r90 bottom
TP26 "TP-SMT-CIRCLE" TP-1.0mm#1 60.025,20.2 r90 bottom
TP28 "TP-SMT-CIRCLE" TP-1.0mm#1 16.325,15.625 r90 bottom
TP29A "TP-SMT-CIRCLE" TP-0.8mm 13.75,88.975 r90 bottom (schematic designator TP29)
TP29B "TP-SMT-CIRCLE" TP-0.8mm 20.675,101.575 r0 bottom (schematic designator TP29)
TP29C "TP-SMT-CIRCLE" TP-0.8mm 58.575,70.85 r90 bottom (schematic designator TP29)
TP30A "TP-SMT-CIRCLE" TP-0.8mm 11.875,103.45 r90 bottom (schematic designator TP30)
TP30B "TP-SMT-CIRCLE" TP-0.8mm 35.15,103.45 r0 bottom (schematic designator TP30)
TP30C "TP-SMT-CIRCLE" TP-0.8mm 56.7,85.325 r90 bottom (schematic designator TP30)
TP31A "TP-SMT-CIRCLE" TP-0.8mm 4.45,108.65 r90 bottom (schematic designator TP31)
TP31B "TP-SMT-CIRCLE" TP-0.8mm 40.35,110.875 r0 bottom (schematic designator TP31)
TP31C "TP-SMT-CIRCLE" TP-0.8mm 49.275,90.525 r90 bottom (schematic designator TP31)
TP32A "TP-SMT-CIRCLE" TP-0.8mm 4.525,88.3 r180 bottom (schematic designator TP32)
TP32B "TP-SMT-CIRCLE" TP-0.8mm 20.125,110.8 r0 bottom (schematic designator TP32)
TP32C "TP-SMT-CIRCLE" TP-0.8mm 49.35,70.175 r90 bottom (schematic designator TP32)
TP33A "TP-SMT-CIRCLE" TP-0.8mm 15.325,99.625 r90 bottom (schematic designator TP33)
TP33B "TP-SMT-CIRCLE" TP-0.8mm 31.325,99.925 r0 bottom (schematic designator TP33)
TP33C "TP-SMT-CIRCLE" TP-0.8mm 60.225,81.5 r90 bottom (schematic designator TP33)
TP34A "TP-SMT-CIRCLE" TP-0.8mm 8.025,108.65 r90 bottom (schematic designator TP34)
TP34B "TP-SMT-CIRCLE" TP-0.8mm 40.35,107.35 r0 bottom (schematic designator TP34)
TP34C "TP-SMT-CIRCLE" TP-0.8mm 52.875,90.525 r90 bottom (schematic designator TP34)
TP35A "TP-SMT-CIRCLE" TP-0.8mm 11.825,93.125 r90 bottom (schematic designator TP35)
TP35B "TP-SMT-CIRCLE" TP-0.8mm 24.85,103.5 r0 bottom (schematic designator TP35)
TP35C "TP-SMT-CIRCLE" TP-0.8mm 56.525,75.025 r90 bottom (schematic designator TP35)
TP36A "TP-SMT-CIRCLE" TP-0.8mm 11.5,99.625 r90 bottom (schematic designator TP36)
TP36B "TP-SMT-CIRCLE" TP-0.8mm 31.3,103.775 r0 bottom (schematic designator TP36)
TP36C "TP-SMT-CIRCLE" TP-0.8mm 56.35,81.5 r90 bottom (schematic designator TP36)
TP37A "TP-SMT-CIRCLE" TP-0.8mm 3.375,111.05 r90 bottom (schematic designator TP37)
TP37B "TP-SMT-CIRCLE" TP-0.8mm 42.775,112 r0 bottom (schematic designator TP37)
TP37C "TP-SMT-CIRCLE" TP-0.8mm 48.05,92.95 r90 bottom (schematic designator TP37)
TP38A "TP-SMT-CIRCLE" TP-0.8mm 9.55,112.925 r90 bottom (schematic designator TP38)
TP38B "TP-SMT-CIRCLE" TP-0.8mm 44.625,105.7 r0 bottom (schematic designator TP38)
TP38C "TP-SMT-CIRCLE" TP-0.8mm 54.425,94.8 r90 bottom (schematic designator TP38)
TP39 "TP-SMT-CIRCLE" TP-0.8mm 42.775,35.675 r90 bottom
TP40 "TP-SMT-CIRCLE" TP-0.8mm 40.825,43.875 r90 bottom
U1 "TIM 2-0911" "TIM 2-0911" 29.425,63.935 r90 bottom
U2 "TPS7A4533KTTR" KTT0005A 9.85,22.4 r270 bottom
U3 "TPS7A9401DSCR" FP-DSC0010J-MFG 25.075,85.825 r270 top
U4 "TLV74033PDBVR" SOT-23-5-N 31.325,86.075 r270 top
U5 "TPS74801RGWT" RGW0020A_V 25.7,27.6 r270 top
U6 "NRF52840-QIAA" NRF52840-QIAA 35.825,38.8 r0 bottom
U7 "ISO7760DWR" "TI SOIC-16 ISOLATED" 6.245,51.3 r90 bottom
U8 "ISO7760DWR" "TI SOIC-16 ISOLATED" 18.155,51.3 r90 bottom
U9 "ISO7760DWR" "TI SOIC-16 ISOLATED" 51.855,51.3 r90 bottom
U10 "ISO7760DWR" "TI SOIC-16 ISOLATED" 63.755,51.3 r90 bottom
U11 "TPS2553DDBVR" SOT95P280X145-6N 60.2,14.05 r180 top
U12 "TUSB4041IPAP" PAP0064M 54.35,26.05 r0 bottom
U13 "TPS2553DDBVR" SOT95P280X145-6N 43.175,14.05 r180 top
U14 "TPS2553DDBVR" SOT95P280X145-6N 25.95,14.075 r180 top
U15 "M24C02-FDW6TP" TSSOP-8-N 34.675,18.575 r0 top
U16 "TPS25200DRVR" SON65P200X200X80-7N 13.6,11.6 r180 bottom
U17 "ECMF2-40A100N6" ECMF240A100N6 9.75,9.55 r0 bottom
U18 "ECMF2-40A100N6" ECMF240A100N6 66.372,7.132 r90 bottom
U19 "ECMF2-40A100N6" ECMF240A100N6 49.15,7.1 r90 bottom
U20 "ECMF2-40A100N6" ECMF240A100N6 31.922,7.137 r90 bottom
U21A "DAC8881SRGET" TI-RGE24-2450X2450TP_V 8.525,89.275 r90 bottom (schematic designator U21)
U21B "DAC8881SRGET" TI-RGE24-2450X2450TP_V 20.975,106.8 r0 bottom (schematic designator U21)
U21C "DAC8881SRGET" TI-RGE24-2450X2450TP_V 53.35,71.15 r90 bottom (schematic designator U21)
U22A "OPA2387DSGR" SON50P200X200X80-9N 6.225,106.575 r0 bottom (schematic designator U22)
U22B "OPA2387DSGR" SON50P200X200X80-9N 38.275,109.075 r270 bottom (schematic designator U22)
U22C "OPA2387DSGR" SON50P200X200X80-9N 51.05,88.45 r0 bottom (schematic designator U22)
U23A "THS4536RUNR" THS4536RUNR 12.775,101.45 r180 bottom (schematic designator U23)
U23B "THS4536RUNR" THS4536RUNR 33.15,102.55 r90 bottom (schematic designator U23)
U23C "THS4536RUNR" THS4536RUNR 57.55,83.325 r180 bottom (schematic designator U23)
U24A "TMUX1111RSVR" RSV0016A-MFG 6.225,109.85 r0 bottom (schematic designator U24)
U24B "TMUX1111RSVR" RSV0016A-MFG 41.55,109.075 r270 bottom (schematic designator U24)
U24C "TMUX1111RSVR" RSV0016A-MFG 51.05,91.725 r0 bottom (schematic designator U24)
U25A "REF7012QDGKR" FP-DGK0008A-MFG 5.075,96 r270 bottom (schematic designator U25)
U25B "REF7012QDGKR" FP-DGK0008A-MFG 27.7,110.25 r180 bottom (schematic designator U25)
U25C "REF7012QDGKR" FP-DGK0008A-MFG 49.9,77.875 r270 bottom (schematic designator U25)
U26A "OPA2387DSGR" SON50P200X200X80-9N 9.225,96.4 r270 bottom (schematic designator U26)
U26B "OPA2387DSGR" SON50P200X200X80-9N 28.1,106.1 r180 bottom (schematic designator U26)
U26C "OPA2387DSGR" SON50P200X200X80-9N 54.05,78.275 r270 bottom (schematic designator U26)
Y1 "32.768 kHz" XTAL-2.0x1.2 28.85,35.825 r0 bottom
Y2 "32.0 MHz" XTAL-2.0x1.6 40.575,33.725 r180 bottom
Y3 "24 MHz" XTAL-5.0x3.2-ECS 56.85,37.15 r0 top

## Footprints (in the part's own frame and the unit in brackets; to place one, negate y for a bottom-side part, rotate by r counter-clockwise, add the part's x,y. Pads: shape width x height; smd on the part's side, far side on the other; paste and mask are expansions set on the pad)
78408053006 [mm] "Wurth Elektronik 78408053006"
  rect 0.9x5.3 smd paste-4 mask+0: 1(-2.3,0) 2(2.3,0)
  Top Layer region: 2.75,2.65 2.75,-2.65 0.75,-2.65 0.75,-1.638 0.859,-1.584 0.977,-1.514 1.089,-1.436 1.196,-1.349 1.295,-1.254 1.386,-1.152 1.47,-1.044 1.545,-0.929 1.612,-0.809 1.669,-0.684 1.716,-0.555 1.753,-0.423 1.78,-0.289 1.797,-0.153 1.804,-0.016 1.799,0.121 1.785,0.258 1.76,0.393 1.725,0.525 1.68,0.655 1.626,0.781 1.561,0.902 1.488,1.018 1.406,1.128 1.316,1.231 1.219,1.328 1.114,1.417 1.003,1.497 0.886,1.569 0.75,1.638 0.75,2.65
  Top Layer region: -0.75,2.65 -0.75,1.638 -0.886,1.569 -1.003,1.497 -1.114,1.417 -1.219,1.328 -1.316,1.231 -1.406,1.128 -1.488,1.018 -1.561,0.902 -1.626,0.781 -1.68,0.655 -1.725,0.525 -1.76,0.393 -1.785,0.258 -1.799,0.121 -1.804,-0.016 -1.797,-0.153 -1.78,-0.289 -1.753,-0.423 -1.716,-0.555 -1.669,-0.684 -1.612,-0.809 -1.545,-0.929 -1.47,-1.044 -1.386,-1.152 -1.295,-1.254 -1.196,-1.349 -1.089,-1.436 -0.977,-1.514 -0.859,-1.584 -0.75,-1.638 -0.75,-2.65 -2.75,-2.65 -2.75,2.65
  silkscreen extent -2.65,-3.32 0.4,2.55, body extent -2.45,-2.45 2.45,2.45, height 2.86
CAP-RD-8.4x9.5x11.6 [mm] "Ceramic disc, diameter 8.4mm, lead spacing 9.5, height 11.6"
  round 1.3 hole 0.9: 1(-4.75,-1.6) 2(4.75,1.6)
  silkscreen extent -5.5,-2.85 5.5,2.85, body extent -6.08,-2.85 5.98,2.85, height 11.69